# Altium PCB 14MV1.PcbDoc (part 1 of 2)
Units mm, origin at the board's own origin, x right, y up, seen from the top; angles counter-clockwise.
Board outline 48 x 30 mm, 4 copper layers (Top Layer, Layer 1, Layer 2, Bottom Layer), stack 1.743 mm thick; 166 components, 120 nets, 638 pads, 401 vias.
Unrouted connection lines stored in the file: 3.
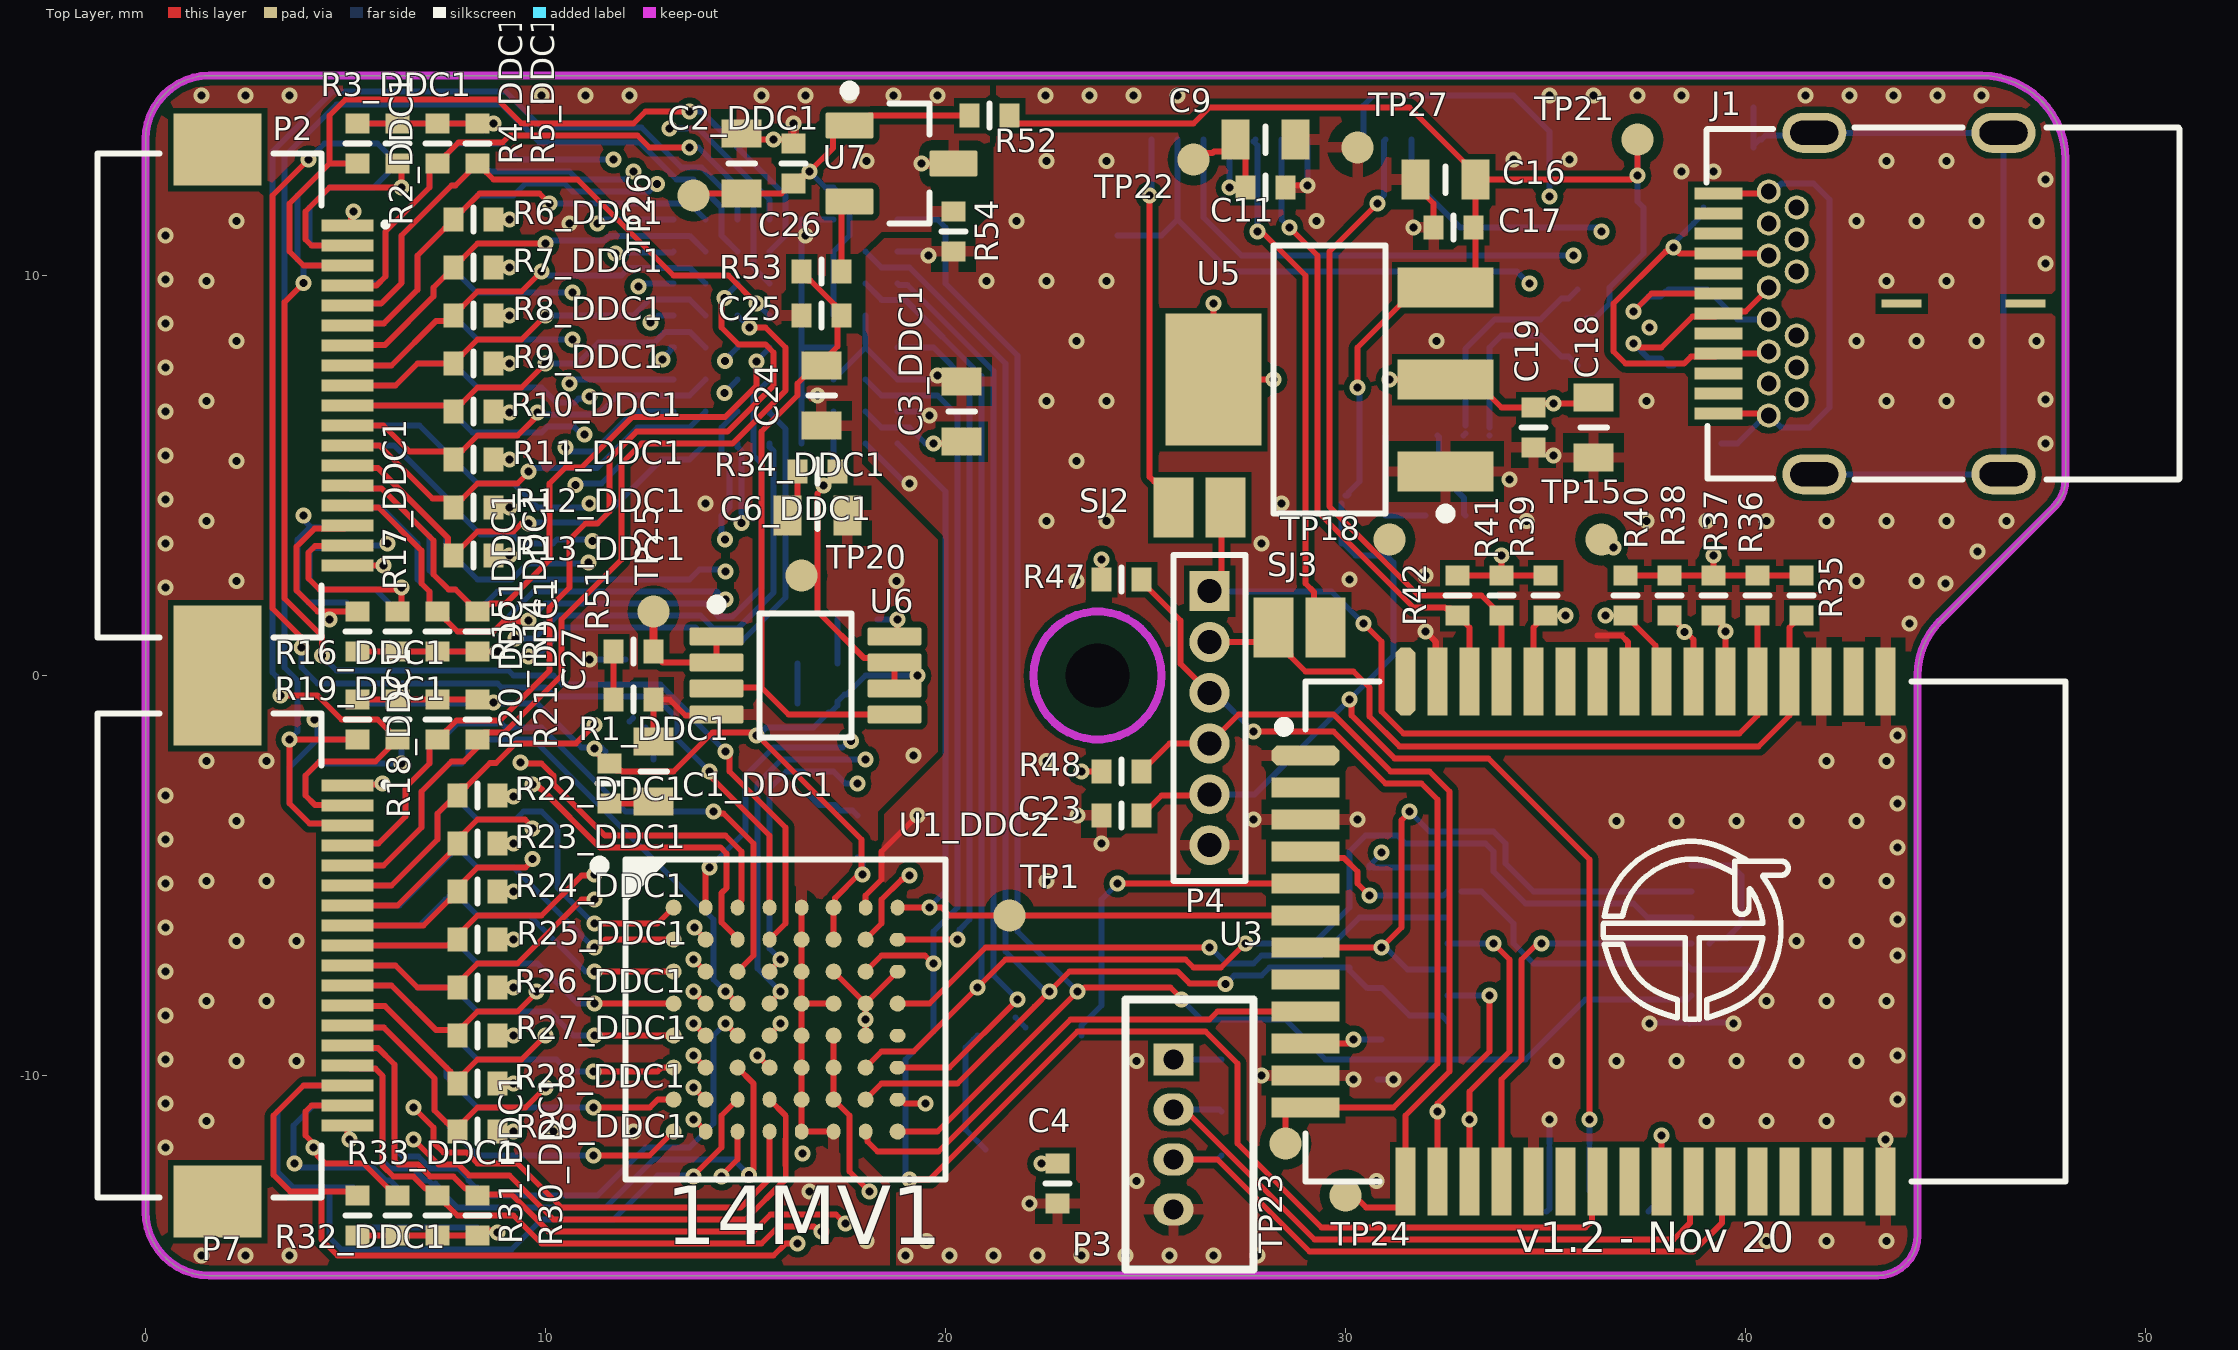
[diagram p0: Top Layer view]
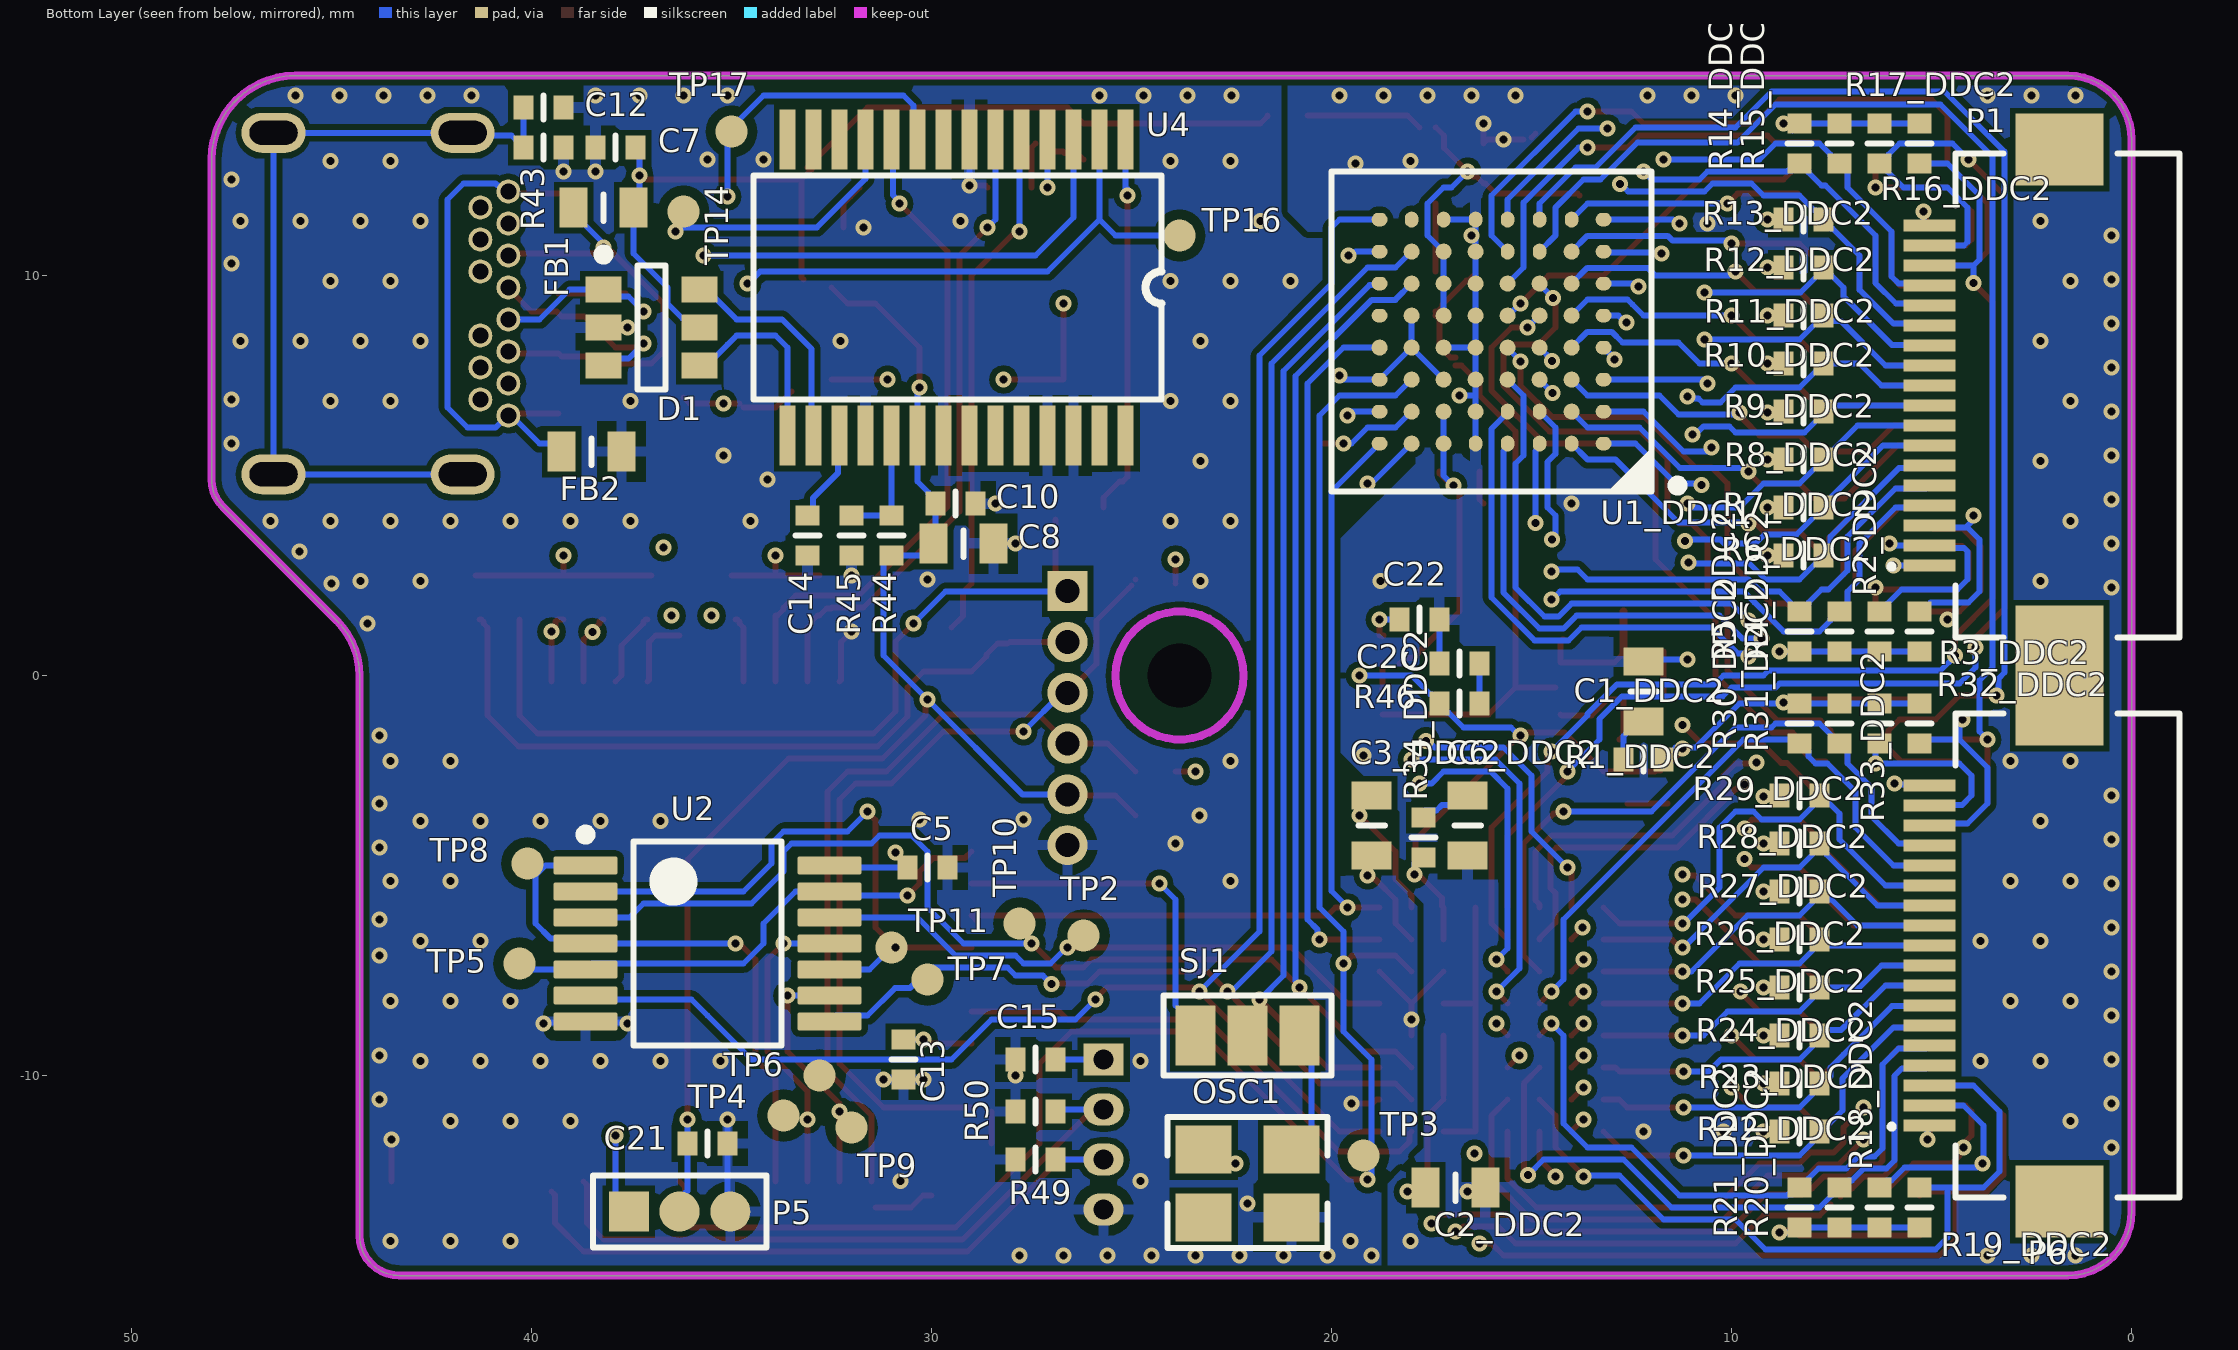
[diagram p1: Bottom Layer view, seen from below]
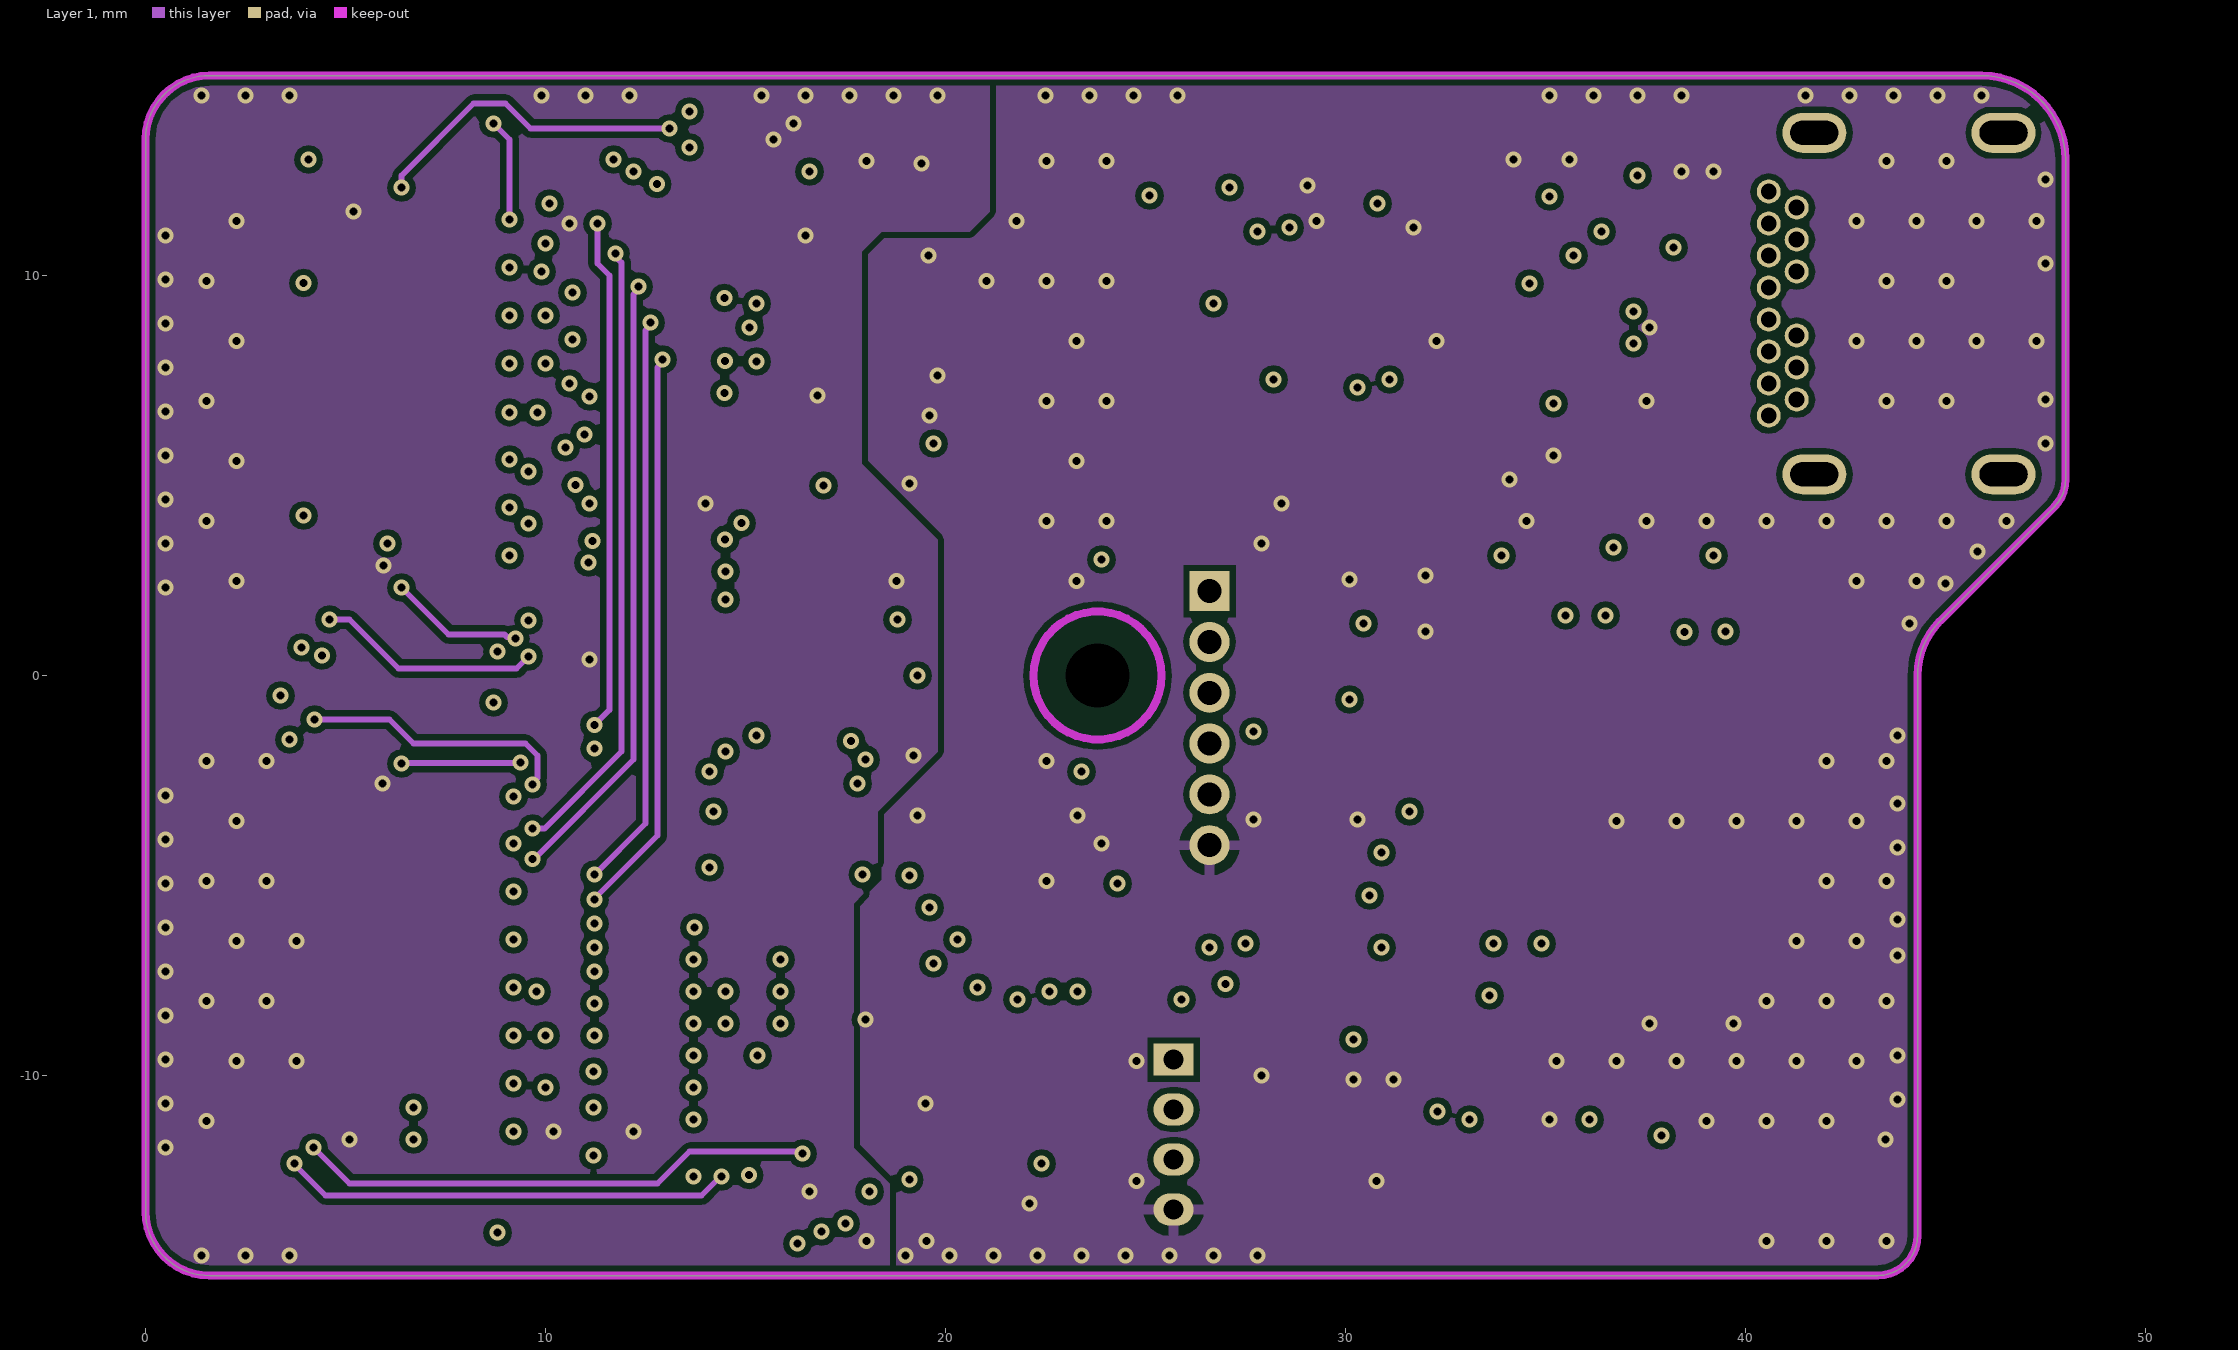
[diagram p2: Layer 1]
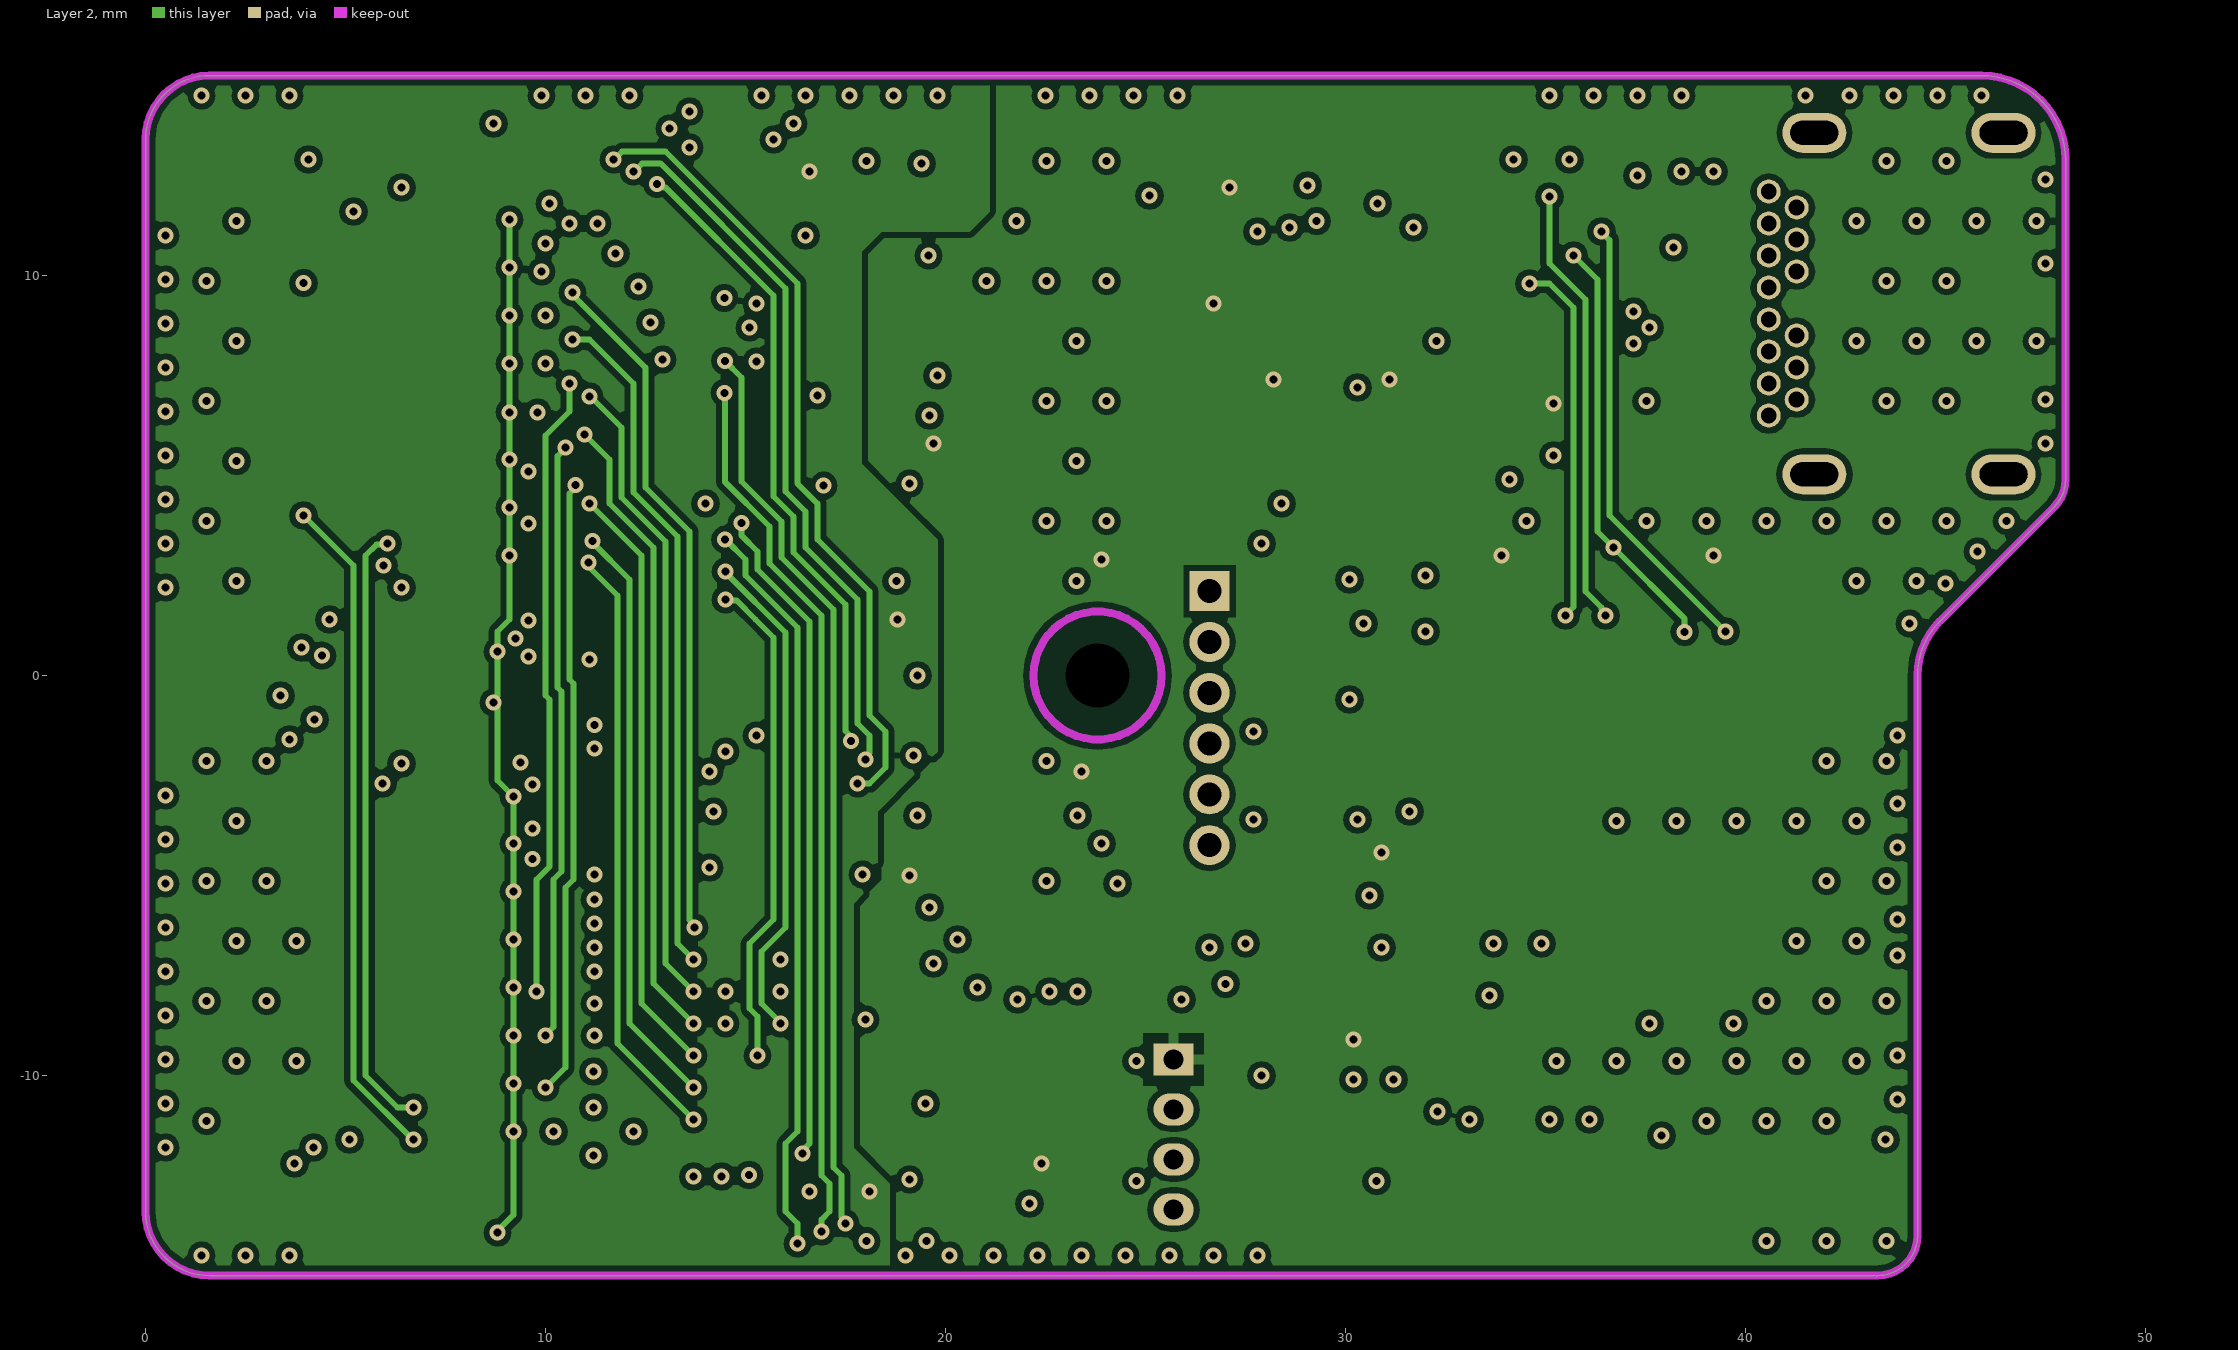
[diagram p3: Layer 2]

## Layer stack, top to bottom
Top Solder: solder mask 0.0102, Solder Resist, Dk 3.5
Top Layer: signal copper 0.0356
Dielectric 1: prepreg 0.0711, PP-006, Dk 4.1
Layer 1: signal copper 0.035
Dielectric1: core 1.46, FR-4, Dk 4.8
Layer 2: signal copper 0.035
Dielectric 2: prepreg 0.0711, PP-006, Dk 4.1
Bottom Layer: signal copper 0.0356
Bottom Solder: solder mask 0.0102, Solder Resist, Dk 3.5

## Board outline
0,-13.4 0,13.4 cw(c1.6,13.4) 1.6,15 45.9,15 cw(c45.9,12.9) 48,12.9 48,4.9 cw(c47.034,4.9) 47.717,4.217 44.866,1.366 ccw(c46.231,0) 44.3,0 44.3,-14 cw(c43.3,-14) 43.3,-15 1.6,-15 cw(c1.6,-13.4)

## Design rules (kind name [scope] priority, off if disabled: settings)
Clearance [All] p1: gap=0.15 ignorepadtopadclearanceinfootprint=FALSE
DiffPairsRouting [All] p1: maxlimit=0.3 minlimit=0.2 mostfreqgap=0.2 toplayer_minwidth=0.2 toplayer_maxwidth=1 toplayer_prefwidth=0.2 midlayer1_minwidth=0.2 midlayer1_maxwidth=1 midlayer1_prefwidth=0.2 midlayer2_minwidth=0.2 midlayer2_maxwidth=1 midlayer2_prefwidth=0.2 bottomlayer_minwidth=0.2 bottomlayer_maxwidth=1 bottomlayer_prefwidth=0.2 maxuncoupledlength=12.7
HoleSize [All] p1: absolutevalues=TRUE maxlimit=10 minlimit=0.025 maxpercent=80.000 minpercent=20.000
MinimumSolderMaskSliver [All] p1: minsoldermaskwidth=0
PolygonConnect PolygonConnect_1 [(InComponentClass('All Components'))] p1: connectstyle=Relief reliefconductorwidth=0.254 reliefentries=4 polygonreliefangle="90 Angle" airgapwidth=0.254
PolygonConnect [All] p2: connectstyle=Direct reliefconductorwidth=0.254 reliefentries=4 polygonreliefangle="90 Angle" airgapwidth=0.254
RoutingVias [All] p1: holewidth=0.3 width=0.6 viastyle="Through Hole" minholewidth=0.2 minwidth=0.4 maxholewidth=1 maxwidth=2
SilkToSilkClearance [All] p1: silktosilkclearance=-10
SilkToSolderMaskClearance SilkscreenOverComponentPads [IsPad] p1: minsilkscreentomaskgap=-10 clearancetoexposedcopper=TRUE
SolderMaskExpansion [All] p1: expansion=0.102 istentingtop=FALSE
Width [All] p1: maxlimit=2 minlimit=0.15 preferedwidth=0.3
25 further rules are at their usual default settings.

## Classes and differential pairs
channel class DDC: DDC1 DDC2
component class DDC1: C1_DDC1 C2_DDC1 C3_DDC1 C6_DDC1 R1_DDC1 R2_DDC1 R3_DDC1 R4_DDC1 R5_DDC1 R6_DDC1 R7_DDC1 R8_DDC1 R9_DDC1 R10_DDC1 R11_DDC1 R12_DDC1 R13_DDC1 R14_DDC1 R15_DDC1 R16_DDC1 R17_DDC1 R18_DDC1 R19_DDC1 R20_DDC1 R21_DDC1 R22_DDC1 R23_DDC1 R24_DDC1 R25_DDC1 R26_DDC1 R27_DDC1 R28_DDC1 R29_DDC1 R30_DDC1 R31_DDC1 R32_DDC1 R33_DDC1 R34_DDC1 U1_DDC1
component class DDC2: C1_DDC2 C2_DDC2 C3_DDC2 C6_DDC2 R1_DDC2 R2_DDC2 R3_DDC2 R4_DDC2 R5_DDC2 R6_DDC2 R7_DDC2 R8_DDC2 R9_DDC2 R10_DDC2 R11_DDC2 R12_DDC2 R13_DDC2 R14_DDC2 R15_DDC2 R16_DDC2 R17_DDC2 R18_DDC2 R19_DDC2 R20_DDC2 R21_DDC2 R22_DDC2 R23_DDC2 R24_DDC2 R25_DDC2 R26_DDC2 R27_DDC2 R28_DDC2 R29_DDC2 R30_DDC2 R31_DDC2 R32_DDC2 R33_DDC2 R34_DDC2 U1_DDC2
component class 14MV1: C4 C5 C7 C8 C9 C10 C11 C12 C13 C14 C15 C16 C17 C18 C19 C20 C21 C22 C23 C24 C25 C26 C27 D1 FB1 FB2 J1 OSC1 P1 P2 P3 P4 P5 P6 P7 R35 R36 R37 R38 R39 R40 R41 R42 R43 R44 R45 R46 R47 R48 R49 R50 R51 R52 R53 R54 SJ1 SJ2 SJ3 TP1 TP2 TP3 TP4 TP5 TP6 TP7 TP8 TP9 TP10 TP11 TP14 TP15 TP16 TP17 TP18 TP20 TP21 TP22 TP23 TP24 TP25 TP26 TP27 U2 U3 U4 U5 U6 U7
differential pair USB: +USB_P -USB_N
differential pair D: +D_P -D_N

## Components (designator, comment, footprint, x,y, rotation, side; value= is the part's Value field where it differs from the comment)
C1_DDC1 "10u" 0603 12.7,-2.4 r90 top (schematic designator C1)
C1_DDC2 "10u" 0603 12.2,-0.4 r90 bottom (schematic designator C1)
C2_DDC1 "10u" 0603 14.9,12.8 r270 top (schematic designator C2)
C2_DDC2 "10u" 0603 16.9,-12.8 r0 bottom (schematic designator C2)
C3_DDC1 "10u" 0603 20.4,6.6 r270 top (schematic designator C3)
C3_DDC2 "10u" 0603 19,-3.75 r270 bottom (schematic designator C3)
C4 "100n" 0402 22.8,-12.7 r270 top
C5 "100n" 0402 30.1,-4.8 r0 bottom
C6_DDC1 "10u" 0603 16.8,4 r0 top (schematic designator C6)
C6_DDC2 "10u" 0603 16.599,-3.75 r270 bottom (schematic designator C6)
C7 "100n" 0402 37.9,13.2 r0 bottom
C8 "10u" 0603 29.2,3.3 r180 bottom
C9 "10u" 0603 28,13.4 r0 top
C10 "100n" 0402 29.4,4.3 r180 bottom
C11 "100n" 0402 28,12.2 r0 top
C12 "100n" 0402 39.7,14.2 r180 bottom
C13 "100n" 0402 30.7,-9.6 r270 bottom
C14 "100n" 0402 33.1,3.5 r90 bottom
C15 "100n" 0402 27.4,-9.6 r0 bottom
C16 "10u" 0603 32.5,12.4 r180 top
C17 "100n" 0402 32.7,11.2 r180 top
C18 "10u" 0603 36.2,6.2 r270 top
C19 "100n" 0402 34.7,6.2 r270 top
C20 "100n" 0402 16.8,0.3 r0 bottom
C21 "100n" 0402 35.6,-11.7 r180 bottom
C22 "100n" 0402 17.8,1.4 r180 bottom
C23 "100n" 0402 24.4,-3.5 r180 top
C24 "10u" 0603 16.9,7 r270 top
C25 "100n" 0402 16.9,9 r180 top
C26 "100n" 0402 16.2,12.8 r90 top
C27 "100n" 0402 12.2,-0.6 r0 top
D1 "USBLC6-2SC6" SOT23-6 37,8.7 r180 bottom
FB1 "7427922808" 0603 38.2,11.7 r0 bottom
FB2 "7427922808" 0603 38.5,5.6 r180 bottom
J1 "632723100011" 632723100011 47.8,9.3 r90 top
OSC1 "ASE-10.000MHZ-LC-T" XTAL_SMD3225 22.1,-12.7 r90 bottom
P1 "FH12-18S-0.5SH(55)" FH12-18S-0.5SH(55) 4.4,7 r90 bottom locked
P2 "FH12-18S-0.5SH(55)" FH12-18S-0.5SH(55) 4.4,7 r270 top locked
P3 "530470410" MOLEX_4_V 25.7,-9.6 r270 top
P4 "MHDR1X6" MHDR1X6 26.6,2.11 r270 top
P5 "MHDR1X3" MHDR1X3 37.57,-13.4 r180 bottom
P6 "FH12-18S-0.5SH(55)" FH12-18S-0.5SH(55) 4.4,-7 r90 bottom locked
P7 "FH12-18S-0.5SH(55)" FH12-18S-0.5SH(55) 4.4,-7 r270 top locked
R1_DDC1 "0R68" 0402 11.6,-2.7 r90 top (schematic designator R1)
R1_DDC2 "0R68" 0402 12.2,-2.1 r180 bottom (schematic designator R1)
R2_DDC1 "13M" 0402 6.3,13.3 r90 top (schematic designator R2)
R2_DDC2 "13M" 0402 6.3,1.1 r270 bottom (schematic designator R2)
R3_DDC1 "13M" 0402 5.3,13.3 r90 top (schematic designator R3)
R3_DDC2 "13M" 0402 5.3,1.1 r270 bottom (schematic designator R3)
R4_DDC1 "13M" 0402 7.3,13.3 r90 top (schematic designator R4)
R4_DDC2 "13M" 0402 7.3,1.1 r270 bottom (schematic designator R4)
R5_DDC1 "13M" 0402 8.3,13.3 r90 top (schematic designator R5)
R5_DDC2 "13M" 0402 8.3,1.1 r270 bottom (schematic designator R5)
R6_DDC1 "13M" 0402 8.2,11.4 r0 top (schematic designator R6)
R6_DDC2 "13M" 0402 8.2,3 r0 bottom (schematic designator R6)
R7_DDC1 "13M" 0402 8.2,10.2 r0 top (schematic designator R7)
R7_DDC2 "13M" 0402 8.2,4.2 r0 bottom (schematic designator R7)
R8_DDC1 "13M" 0402 8.2,9 r0 top (schematic designator R8)
R8_DDC2 "13M" 0402 8.2,5.4 r0 bottom (schematic designator R8)
R9_DDC1 "13M" 0402 8.2,7.8 r0 top (schematic designator R9)
R9_DDC2 "13M" 0402 8.2,6.6 r0 bottom (schematic designator R9)
R10_DDC1 "13M" 0402 8.2,6.6 r0 top (schematic designator R10)
R10_DDC2 "13M" 0402 8.2,7.8 r0 bottom (schematic designator R10)
R11_DDC1 "13M" 0402 8.2,5.4 r0 top (schematic designator R11)
R11_DDC2 "13M" 0402 8.2,9 r0 bottom (schematic designator R11)
R12_DDC1 "13M" 0402 8.2,4.2 r0 top (schematic designator R12)
R12_DDC2 "13M" 0402 8.2,10.2 r0 bottom (schematic designator R12)
R13_DDC1 "13M" 0402 8.2,3 r0 top (schematic designator R13)
R13_DDC2 "13M" 0402 8.2,11.4 r0 bottom (schematic designator R13)
R14_DDC1 "13M" 0402 8.3,1.1 r270 top (schematic designator R14)
R14_DDC2 "13M" 0402 8.3,13.3 r90 bottom (schematic designator R14)
R15_DDC1 "13M" 0402 7.3,1.1 r270 top (schematic designator R15)
R15_DDC2 "13M" 0402 7.3,13.3 r90 bottom (schematic designator R15)
R16_DDC1 "13M" 0402 5.3,1.1 r270 top (schematic designator R16)
R16_DDC2 "13M" 0402 5.3,13.3 r90 bottom (schematic designator R16)
R17_DDC1 "13M" 0402 6.3,1.1 r270 top (schematic designator R17)
R17_DDC2 "13M" 0402 6.3,13.3 r90 bottom (schematic designator R17)
R18_DDC1 "13M" 0402 6.3,-1.1 r90 top (schematic designator R18)
R18_DDC2 "13M" 0402 6.3,-13.3 r270 bottom (schematic designator R18)
R19_DDC1 "13M" 0402 5.3,-1.1 r90 top (schematic designator R19)
R19_DDC2 "13M" 0402 5.3,-13.3 r270 bottom (schematic designator R19)
R20_DDC1 "13M" 0402 7.3,-1.1 r90 top (schematic designator R20)
R20_DDC2 "13M" 0402 7.3,-13.3 r270 bottom (schematic designator R20)
R21_DDC1 "13M" 0402 8.3,-1.1 r90 top (schematic designator R21)
R21_DDC2 "13M" 0402 8.3,-13.3 r270 bottom (schematic designator R21)
R22_DDC1 "13M" 0402 8.3,-3 r0 top (schematic designator R22)
R22_DDC2 "13M" 0402 8.3,-11.4 r0 bottom (schematic designator R22)
R23_DDC1 "13M" 0402 8.3,-4.2 r0 top (schematic designator R23)
R23_DDC2 "13M" 0402 8.3,-10.2 r0 bottom (schematic designator R23)
R24_DDC1 "13M" 0402 8.3,-5.4 r0 top (schematic designator R24)
R24_DDC2 "13M" 0402 8.3,-9 r0 bottom (schematic designator R24)
R25_DDC1 "13M" 0402 8.3,-6.6 r0 top (schematic designator R25)
R25_DDC2 "13M" 0402 8.3,-7.8 r0 bottom (schematic designator R25)
R26_DDC1 "13M" 0402 8.3,-7.8 r0 top (schematic designator R26)
R26_DDC2 "13M" 0402 8.3,-6.6 r0 bottom (schematic designator R26)
R27_DDC1 "13M" 0402 8.3,-9 r0 top (schematic designator R27)
R27_DDC2 "13M" 0402 8.3,-5.4 r0 bottom (schematic designator R27)
R28_DDC1 "13M" 0402 8.3,-10.2 r0 top (schematic designator R28)
R28_DDC2 "13M" 0402 8.3,-4.2 r0 bottom (schematic designator R28)
R29_DDC1 "13M" 0402 8.3,-11.4 r0 top (schematic designator R29)
R29_DDC2 "13M" 0402 8.3,-3 r0 bottom (schematic designator R29)
R30_DDC1 "13M" 0402 8.3,-13.5 r270 top (schematic designator R30)
R30_DDC2 "13M" 0402 8.3,-1.2 r90 bottom (schematic designator R30)
R31_DDC1 "13M" 0402 7.3,-13.5 r270 top (schematic designator R31)
R31_DDC2 "13M" 0402 7.3,-1.2 r90 bottom (schematic designator R31)
R32_DDC1 "13M" 0402 5.3,-13.5 r270 top (schematic designator R32)
R32_DDC2 "13M" 0402 5.3,-1.2 r90 bottom (schematic designator R32)
R33_DDC1 "13M" 0402 6.3,-13.5 r270 top (schematic designator R33)
R33_DDC2 "13M" 0402 6.3,-1.2 r90 bottom (schematic designator R33)
R34_DDC1 "0R68" 0402 16.8,5.1 r0 top (schematic designator R34)
R34_DDC2 "0R68" 0402 17.7,-4.05 r270 bottom (schematic designator R34)
R35 "10k" 0402 41.4,2 r90 top
R36 "10k" 0402 40.3,2 r90 top
R37 "10k" 0402 39.2,2 r90 top
R38 "10k" 0402 38.1,2 r90 top
R39 "10k" 0402 35,2 r90 top
R40 "10k" 0402 37,2 r90 top
R41 "10k" 0402 33.9,2 r90 top
R42 "10k" 0402 32.8,2 r90 top
R43 "10k" 0402 39.7,13.2 r0 bottom
R44 "4k7" 0402 31,3.5 r270 bottom
R45 "10k" 0402 32,3.5 r270 bottom
R46 "0R68" 0402 16.8,-0.7 r0 bottom
R47 "10k" 0402 24.4,2.4 r180 top
R48 "10k" 0402 24.4,-2.4 r180 top
R49 "10k" 0402 27.4,-12.1 r0 bottom
R50 "NM" 0402 27.4,-10.9 r0 bottom
R51 "0R68" 0402 12.2,0.6 r0 top
R52 "0R" 0402 21.1,14 r0 top
R53 "1k" 0402 16.9,10.1 r0 top
R54 "0R" 0402 20.2,11.1 r270 top
SJ1 "Sold Jum" Solder_j2 23.4,-9 r180 bottom
SJ2 "Sold Jum" Solder_j 25.7,4.2 r180 top
SJ3 "Sold Jum" Solder_j 29.5,1.2 r0 top
TP1 "TestPoint" PIAZZOLA 21.6,-6 r90 top
TP2 "TestPoint" PIAZZOLA 26.2,-6.5 r90 bottom
TP3 "TestPoint" PIAZZOLA 19.2,-12 r90 bottom
TP4 "TestPoint" PIAZZOLA 33.7,-11 r90 bottom
TP5 "TestPoint" PIAZZOLA 40.3,-7.2 r90 bottom
TP6 "TestPoint" PIAZZOLA 32.8,-10 r90 bottom
TP7 "TestPoint" PIAZZOLA 30.1,-7.6 r90 bottom
TP8 "TestPoint" PIAZZOLA 40.1,-4.7 r90 bottom
TP9 "TestPoint" PIAZZOLA 32,-11.3 r90 bottom
TP10 "TestPoint" PIAZZOLA 27.8,-6.2 r90 bottom
TP11 "TestPoint" PIAZZOLA 31,-6.8 r90 bottom
TP14 "TestPoint" PIAZZOLA 36.2,11.6 r90 bottom
TP15 "TestPoint" PIAZZOLA 36.4,3.4 r90 top
TP16 "TestPoint" PIAZZOLA 23.8,11 r90 bottom
TP17 "TestPoint" PIAZZOLA 35,13.6 r90 bottom
TP18 "TestPoint" PIAZZOLA 31.1,3.4 r90 top
TP20 "TestPoint" PIAZZOLA 16.4,2.5 r90 top
TP21 "TestPoint" PIAZZOLA 37.3,13.4 r90 top
TP22 "TestPoint" PIAZZOLA 26.2,12.9 r90 top
TP23 "TestPoint" PIAZZOLA 28.5,-11.7 r90 top
TP24 "TestPoint" PIAZZOLA 30,-13 r90 top
TP25 "TestPoint" PIAZZOLA 12.7,1.6 r90 top
TP26 "TestPoint" PIAZZOLA 13.7,12 r90 top
TP27 "TestPoint" PIAZZOLA 30.3,13.2 r90 top
U1_DDC1 "DDC232CZXGR" TI-ZXG64#1 16,8.6 r0 bottom (schematic designator U1)
U1_DDC2 "DDC232CZXGR" TI-ZXG64#2 16,-8.6 r0 top (schematic designator U1)
U2 "SN74HC08PWR" PW0014A_M 35.6,-6.7 r180 bottom
U3 "BL600-SA" LIRD-BL600-SA_V 38.5,-6.4 r270 top
U4 "FT232RL" TSSOP28-W 25.15,13.4 r270 bottom
U5 "LD1117S33CTR" SOT-223_N 29.6,7.4 r180 top
U6 "OPA2350EA/250" DGK0008A_N 16.5,0 r0 top
U7 "REF3040AIDBZT" DBZ0003A_M 18.9,12.8 r0 top

## Footprints (in the part's own frame and the unit in brackets; to place one, negate y for a bottom-side part, rotate by r counter-clockwise, add the part's x,y. Pads: shape width x height; smd on the part's side, far side on the other; paste and mask are expansions set on the pad)
0402 [mm]
  rect 0.5x0.6 smd: 1(-0.5,0) 2(0.5,0)
  silkscreen extent 0,-0.3 0,0.3, body extent -0.5,-0.25 0.5,0.25, height 0.35
0603 [mm]
  rect 0.7x1 smd: 1(-0.75,0) 2(0.75,0)
  silkscreen extent 0,-0.33 0,0.33, body extent -0.85,-0.47 0.85,0.48, height 0.6
632723100011 [mm]
  rect 0.3x1.2 smd: A1(-2.75,8.48) A2(-2.25,8.48) A3(-1.75,8.48) A4(-1.25,8.48) A5(-0.75,8.48) A6(-0.25,8.48) A7(0.25,8.48) A8(0.75,8.48) A9(1.25,8.48) A10(1.75,8.48) A11(2.25,8.48) A12(2.75,8.48)
  round 0.6 hole 0.4: B1(2.8,7.22) B2(2.4,6.52) B3(1.6,6.52) B4(1.2,7.22) B5(0.8,6.52) B6(0.4,7.22) B7(-0.4,7.22) B8(-0.8,6.52) B9(-1.2,7.22) B10(-1.6,6.52) B11(-2.4,6.52) B12(-2.8,7.22) GND(-2,7.22) GND(2,7.22)
  oval 1x1.6 hole 0.6 slot 1.2 at 90 deg: Shell(-4.27,6.08) Shell(-4.27,1.35) Shell(4.27,6.08) Shell(4.27,1.35)
  rect 0.2x1 smd: ""(0,3.9) ""(0,0.8)
  silkscreen extent -4.4,-3.05 4.4,8.77, body extent -4.4,-3.02 4.34,8.77, height 3.08
DBZ0003A_M [mm] "SOT23, 3-Leads, Body 3.04x1.4mm, Pitch 0.95mm, IPC Low Density"
  rrect15% 1.2x0.65 smd: 1(-1.3,0.95) 2(-1.3,-0.95) 3(1.3,0)
  silkscreen extent -1.42,-1.5 0.7,1.95, body extent -1.26,-1.46 1.26,1.46, height 0.96
DGK0008A_N [mm] "TSOP, 8-Leads, Body 3.1x3.1mm, Pitch 0.65mm, IPC Medium Density"
  rrect22% 1.35x0.45 smd: 1(-2.225,0.975) 2(-2.225,0.325) 3(-2.225,-0.325) 4(-2.225,-0.975) 5(2.225,-0.975) 6(2.225,-0.325) 7(2.225,0.325) 8(2.225,0.975)
  silkscreen extent -2.35,-1.55 1.15,1.9, body extent -2.45,-1.5 2.45,1.5, height 0.94
FH12-18S-0.5SH(55) [mm]
  rect 0.3x1.3 smd: 1(-4.25,0.65) 2(-3.75,0.65) 3(-3.25,0.65) 4(-2.75,0.65) 5(-2.25,0.65) 6(-1.75,0.65) 7(-1.25,0.65) 8(-0.75,0.65) 9(-0.25,0.65) 10(0.25,0.65) 11(0.75,0.65) 12(1.25,0.65) 13(1.75,0.65) 14(2.25,0.65) 15(2.75,0.65) 16(3.25,0.65) 17(3.75,0.65) 18(4.25,0.65)
  rect 1.8x2.2 smd: 19(-6.15,-2.6) 20(6.15,-2.6)
  silkscreen extent -6.05,-5.6 6.05,1.62, body extent -6.54,-5.65 6.56,0.75, height 2.1
LIRD-BL600-SA_V [mm] "SMD, 44-Leads, Body 19x12.5mm, Pitch 0.8mm"
  oct 0.5x1.7 smd: 1(-4.4,-9.5)
  rect 0.5x1.7 smd: 2(-3.6,-9.5) 3(-2.8,-9.5) 4(-2,-9.5) 5(-1.2,-9.5) 6(-0.4,-9.5) 7(0.4,-9.5) 8(1.2,-9.5) 9(2,-9.5) 10(2.8,-9.5) 11(3.6,-9.5) 12(4.4,-9.5)
  rect 1.7x0.5 smd: 13(6.25,-7) 14(6.25,-6.2) 15(6.25,-5.4) 16(6.25,-4.6) 17(6.25,-3.8) 18(6.25,-3) 19(6.25,-2.2) 20(6.25,-1.4) 21(6.25,-0.6) 22(6.25,0.2) 23(6.25,1) 24(6.25,1.8) 25(6.25,2.6) 26(6.25,3.4) 27(6.25,4.2) 28(6.25,5) 29(-6.25,5) 30(-6.25,4.2) 31(-6.25,3.4) 32(-6.25,2.6) 33(-6.25,1.8) 34(-6.25,1) 35(-6.25,0.2) 36(-6.25,-0.6) 37(-6.25,-1.4) 38(-6.25,-2.2) 39(-6.25,-3) 40(-6.25,-3.8) 41(-6.25,-4.6) 42(-6.25,-5.4) 43(-6.25,-6.2)
  oct 1.7x0.5 smd: 44(-6.25,-7)
  silkscreen extent -6.25,-10.16 6.25,9.5, body extent -6.25,-9.5 6.25,9.5, height 3.27
MHDR1X3 [mm] "Connector; Header; 3 Position"
  rect 1x1 smd: 1(0,0)
  round 1 smd: 2(1.27,0) 3(2.54,0)
  silkscreen extent -0.9,-0.9 3.44,0.9
MHDR1X6 [mm] "Connector; Header; 6 Position"
  rect 1x1 hole 0.6: 1(0,0)
  round 1 hole 0.6: 2(1.27,0) 3(2.54,0) 4(3.81,0) 5(5.08,0) 6(6.35,0)
  silkscreen extent -0.9,-0.9 7.25,0.9
MOLEX_4_V [mm]
  rect 0.8x1 hole 0.5: 1(0,0)
  oval 0.8x1 hole 0.5: 2(1.25,0) 3(2.5,0) 4(3.75,0)
  silkscreen extent -1.5,-1.2 5.25,2, body extent -1.5,-1.15 5.25,2.05, height 4.2
PIAZZOLA [mm]
  round 0.8 smd: 1(0,0)
PW0014A_M [mm] "SOP, 14-Leads, Body 5.1x4.5mm, Pitch 0.65mm, IPC Low Density"
  rrect22% 1.6x0.45 smd: 1(-3.05,1.95) 2(-3.05,1.3) 3(-3.05,0.65) 4(-3.05,0) 5(-3.05,-0.65) 6(-3.05,-1.3) 7(-3.05,-1.95) 8(3.05,-1.95) 9(3.05,-1.3) 10(3.05,-0.65) 11(3.05,0) 12(3.05,0.65) 13(3.05,1.3) 14(3.05,1.95)
  silkscreen extent -3.17,-2.55 1.85,2.85, body extent -3.21,-2.5 3.21,2.5, height 1
Solder_j [mm]
  rect 1x1.5 smd: 1(-1.3,0) 2(0,0)
Solder_j2 [mm]
  rect 1x1.5 smd: 1(0,0) 2(1.3,0) 3(2.6,0)
  silkscreen extent -0.8,-1 3.4,1
SOT23-6 [mm]
  rect 0.9x0.65 smd: 1(-1.2,0.95) 2(-1.2,0) 3(-1.2,-0.95) 4(1.2,-0.95) 5(1.2,0) 6(1.2,0.95)
  silkscreen extent -1.33,-1.55 0.35,1.95, body extent -0.9,-1.55 0.9,1.55, height 1.45
SOT-223_N [mm] "SOT223, 4-Leads, Body 6.5x3.5mm, Pitch 2.3mm, Lead Span 7mm, IPC Medium Density"
  rect 2.4x1 smd: 1(-2.9,2.3) 2(-2.9,0) 3(-2.9,-2.3)
  rect 2.4x3.3 smd: 4(2.9,0)
  silkscreen extent -3.03,-3.35 1.4,3.47, body extent -1.85,-3.35 1.85,3.35, height 1.8
TI-ZXG64#1 [mm] "BGA, 64-Balls, Body 8x8mm, Pitch 0.8mm"
  oval 0.4x0.34 smd: A1(-2.8,2.8) A8(2.8,2.8) B1(-2.8,2) B8(2.8,2) C1(-2.8,1.2) C8(2.8,1.2) D1(-2.8,0.4) E1(-2.8,-0.4) E8(2.8,-0.4) F1(-2.8,-1.2) F8(2.8,-1.2) G1(-2.8,-2) G8(2.8,-2) H1(-2.8,-2.8) H8(2.8,-2.8)
  oval 0.34x0.4 smd: A2(-2,2.8) A3(-1.2,2.8) A4(-0.4,2.8) A5(0.4,2.8) B3(-1.2,2) B4(-0.4,2) G3(-1.2,-2) G4(-0.4,-2) H2(-2,-2.8) H3(-1.2,-2.8) H4(-0.4,-2.8) H5(0.4,-2.8) H6(1.2,-2.8) H7(2,-2.8)
  round 0.4 smd: A6(1.2,2.8) A7(2,2.8) B2(-2,2) B5(0.4,2) B6(1.2,2) B7(2,2) C2(-2,1.2) C3(-1.2,1.2) C4(-0.4,1.2) C5(0.4,1.2) C6(1.2,1.2) C7(2,1.2) D2(-2,0.4) D3(-1.2,0.4) D4(-0.4,0.4) D5(0.4,0.4) D6(1.2,0.4) D7(2,0.4) D8(2.8,0.4) E2(-2,-0.4) E3(-1.2,-0.4) E4(-0.4,-0.4) E5(0.4,-0.4) E6(1.2,-0.4) E7(2,-0.4) F2(-2,-1.2) F3(-1.2,-1.2) F4(-0.4,-1.2) F5(0.4,-1.2) F6(1.2,-1.2) F7(2,-1.2) G2(-2,-2) G5(0.4,-2) G6(1.2,-2) G7(2,-2)
  silkscreen extent -4.77,-4 4,4, body extent -4,-4 4,4, height 1.45
TI-ZXG64#2 [mm] "BGA, 64-Balls, Body 8x8mm, Pitch 0.8mm"
  round 0.4 smd: A1(-2.8,2.8) A6(1.2,2.8) B1(-2.8,2) B2(-2,2) B5(0.4,2) B6(1.2,2) B7(2,2) C1(-2.8,1.2) C2(-2,1.2) C3(-1.2,1.2) C4(-0.4,1.2) C5(0.4,1.2) C6(1.2,1.2) C7(2,1.2) D1(-2.8,0.4) D2(-2,0.4) D3(-1.2,0.4) D4(-0.4,0.4) D5(0.4,0.4) D6(1.2,0.4) D7(2,0.4) D8(2.8,0.4) E1(-2.8,-0.4) E2(-2,-0.4) E3(-1.2,-0.4) E4(-0.4,-0.4) E5(0.4,-0.4) E6(1.2,-0.4) E7(2,-0.4) F1(-2.8,-1.2) F2(-2,-1.2) F3(-1.2,-1.2) F4(-0.4,-1.2) F5(0.4,-1.2) F6(1.2,-1.2) F7(2,-1.2) G1(-2.8,-2) G2(-2,-2) G5(0.4,-2) G6(1.2,-2) G7(2,-2) H1(-2.8,-2.8) H8(2.8,-2.8)
  oval 0.34x0.4 smd: A2(-2,2.8) A3(-1.2,2.8) A4(-0.4,2.8) A5(0.4,2.8) A7(2,2.8) A8(2.8,2.8) B3(-1.2,2) B4(-0.4,2) G3(-1.2,-2) G4(-0.4,-2) H2(-2,-2.8) H3(-1.2,-2.8) H4(-0.4,-2.8) H5(0.4,-2.8) H6(1.2,-2.8) H7(2,-2.8)
  oval 0.4x0.34 smd: B8(2.8,2) C8(2.8,1.2) E8(2.8,-0.4) F8(2.8,-1.2) G8(2.8,-2)
  silkscreen extent -4.77,-4 4,4, body extent -4,-4 4,4, height 1.45
TSSOP28-W [mm]
  rect 1.5x0.4 smd: 1(0,0) 2(0,-0.65) 3(0,-1.3) 4(0,-1.95) 5(0,-2.6) 6(0,-3.25) 7(0,-3.9) 8(0,-4.55) 9(0,-5.2) 10(0,-5.85) 11(0,-6.5) 12(0,-7.15) 13(0,-7.8) 14(0,-8.45) 15(7.4,-8.45) 16(7.4,-7.8) 17(7.4,-7.15) 18(7.4,-6.5) 19(7.4,-5.85) 20(7.4,-5.2) 21(7.4,-4.55) 22(7.4,-3.9) 23(7.4,-3.25) 24(7.4,-2.6) 25(7.4,-1.95) 26(7.4,-1.3) 27(7.4,-0.65) 28(7.4,0)
  silkscreen extent 0.9,-9.3 6.5,0.9, body extent 0.9,-9.3 6.5,0.9, height 1.75
XTAL_SMD3225 [mm]
  rect 1.2x1.4 smd: 1(-0.85,1.1) 2(-0.85,-1.1) 3(0.85,-1.1) 4(0.85,1.1)
  silkscreen extent -1.61,-2 1.66,2, body extent -1.25,-1.6 1.25,1.6, height 0.61

## Part data
C1_DDC1 C1_DDC2 C2_DDC1 C2_DDC2 C3_DDC1 C3_DDC2 C6_DDC1 C6_DDC2 C8 C9 C16 C18 C24: library part "Cap 10uF", "Capacitor MLCC 25V 10%", LatestRevisionDate=17-Jul-2002, LatestRevisionNote="Re-released for DXP Platform.", Published=8-Jun-2000, Publisher="Altium Limited"
C4 C5 C7 C10 C11 C12 C13 C14 C15 C17 C19 C20 C21 C22 C23 C25 C26 C27: library part "Cap 100nF", "Capacitor X7R 50V 10%", LatestRevisionDate=17-Jul-2002, LatestRevisionNote="Re-released for DXP Platform.", Published=8-Jun-2000, Publisher="Altium Limited"
D1: library part USBUF02W6, "EMI filter and line termination for USB upstream ports", Supplier Part Number 1=497-5235-1-ND, Supplier 1=Digi-Key, Supplier 2=Farnell, Supplier Part Number 2=1269406
FB1 FB2: "Ferrite bead", Supplier Part Number 1=732-6114-1-ND, Supplier 1=Digi-Key, Supplier 2=Farnell, Supplier Part Number 2=2467183
J1: "USB 3.1 Type C Receptacle Horizontal THR WR-COM", Supplier Part Number 1=732-9617-1-ND, ComponentLink1Description=Manufacturer, ComponentLink1URL=http://www.we-online.de, ComponentLink2Description=Datasheet, ComponentLink2URL=http://katalog.we-online.de/em/datasheet/632723x00011.pdf, Construction=THR, Gender=Receptacle, Interface Type="Type C", Part Number=632723100011, Published Date="April 2017", Publisher="Wurth Elektronik", Sub-Family="USB 3.1", Supplier 1=Digi-Key, Supplier 2=Farnell, Supplier Part Number 2=2984360, Type=Horizontal
OSC1: "Oscillator 10 MHz", Supplier Part Number 1=535-9559-1-ND, Supplier 1=Digi-Key, Supplier 2=Mouser, Supplier Part Number 2=815-ASE10.000MHZLCT
P1 P2 P6 P7: "Header, 18-Pin", Supplier Part Number 1=HFJ118CT-ND, LatestRevisionDate=17-Jul-2002, LatestRevisionNote="Re-released for DXP Platform.", Publisher="Altium Limited", Supplier 1=Digi-Key, Supplier 2=RSComponents, Supplier Part Number 2=7388824
P3: "Header, 4-Pin", Supplier Part Number 1=WM1733-ND, LatestRevisionDate=17-Jul-2002, LatestRevisionNote="Re-released for DXP Platform.", Publisher="Altium Limited", Supplier 1=Digi-Key, Supplier 2=Farnell, Supplier Part Number 2=9733060
P4: "Header, 6-Pin", LatestRevisionDate=17-Jul-2002, LatestRevisionNote="Re-released for DXP Platform.", Publisher="Altium Limited"
P5: "Header, 3-Pin", LatestRevisionDate=17-Jul-2002, LatestRevisionNote="Re-released for DXP Platform.", Publisher="Altium Limited"
R1_DDC1 R1_DDC2 R34_DDC1 R34_DDC2 R46 R51: library part "Res 0R68", "Resistor 0.1W 1%", LatestRevisionDate=17-Jul-2002, LatestRevisionNote="Re-released for DXP Platform.", PackageDescription="Axial Device, Thru-Hole; 2 Leads; 0.3 in Pin Spacing", PackageReference=AXIAL-0.3, Published=8-Jun-2000, Publisher="Altium Limited"
R2_DDC1 R2_DDC2 R3_DDC1 R3_DDC2 R4_DDC1 R4_DDC2 R5_DDC1 R5_DDC2 R6_DDC1 R6_DDC2 R7_DDC1 R7_DDC2 R8_DDC1 R8_DDC2 R9_DDC1 R9_DDC2 R10_DDC1 R10_DDC2 R11_DDC1 R11_DDC2 R12_DDC1 R12_DDC2 R13_DDC1 R13_DDC2 R14_DDC1 R14_DDC2 R15_DDC1 R15_DDC2 R16_DDC1 R16_DDC2 R17_DDC1 R17_DDC2 R18_DDC1 R18_DDC2 R19_DDC1 R19_DDC2 R20_DDC1 R20_DDC2 R21_DDC1 R21_DDC2 R22_DDC1 R22_DDC2 R23_DDC1 R23_DDC2 R24_DDC1 R24_DDC2 R25_DDC1 R25_DDC2 R26_DDC1 R26_DDC2 R27_DDC1 R27_DDC2 R28_DDC1 R28_DDC2 R29_DDC1 R29_DDC2 R30_DDC1 R30_DDC2 R31_DDC1 R31_DDC2 R32_DDC1 R32_DDC2 R33_DDC1 R33_DDC2: library part "Res 13M", "Resistor 0.1W 1%", LatestRevisionDate=17-Jul-2002, LatestRevisionNote="Re-released for DXP Platform.", PackageDescription="Axial Device, Thru-Hole; 2 Leads; 0.3 in Pin Spacing", PackageReference=AXIAL-0.3, Published=8-Jun-2000, Publisher="Altium Limited"
R35 R36 R37 R38 R39 R40 R41 R42 R43 R45 R47 R48 R49: library part "Res 10k", "Resistor 0.1W 1%", LatestRevisionDate=17-Jul-2002, LatestRevisionNote="Re-released for DXP Platform.", PackageDescription="Axial Device, Thru-Hole; 2 Leads; 0.3 in Pin Spacing", PackageReference=AXIAL-0.3, Published=8-Jun-2000, Publisher="Altium Limited"
R44: library part "Res 4k7", "Resistor 0.1W 1%", LatestRevisionDate=17-Jul-2002, LatestRevisionNote="Re-released for DXP Platform.", PackageDescription="Axial Device, Thru-Hole; 2 Leads; 0.3 in Pin Spacing", PackageReference=AXIAL-0.3, Published=8-Jun-2000, Publisher="Altium Limited"
R50: library part "Res NM", "Resistor 0.1W 1%", Fitted=NO, Published=8-Jun-2000, Publisher="Altium Limited", Revision="July-2002: Re-released for DXP Platform."
R52 R54: library part "Res 0R", "Resistor 0.1W 1%", LatestRevisionDate=17-Jul-2002, LatestRevisionNote="Re-released for DXP Platform.", PackageDescription="Axial Device, Thru-Hole; 2 Leads; 0.3 in Pin Spacing", PackageReference=AXIAL-0.3, Published=8-Jun-2000, Publisher="Altium Limited"
R53: library part "Res 1k", "Resistor 0.1W 1%", LatestRevisionDate=17-Jul-2002, LatestRevisionNote="Re-released for DXP Platform.", PackageDescription="Axial Device, Thru-Hole; 2 Leads; 0.3 in Pin Spacing", PackageReference=AXIAL-0.3, Published=8-Jun-2000, Publisher="Altium Limited"
SJ1: library part SJ2, "Double solder jumper"
SJ2 SJ3: library part SJ, "Solder Jumper"
U1_DDC1 U1_DDC2: library part DDC232, "32 Channel Current-Input 20-Bit ADC, 0 to 70 degC, 64-pin BGA (ZXG64), Green (RoHS & no Sb/Br)", Analog Voltage AV/DD(Max)(V)=5.25, Analog Voltage AV/DD(Min)(V)=4.75, Manufacturer="Texas Instruments", Supplier Part Number 1=296-23858-1-ND, # Input Channels=32, Architecture=Delta-Sigma, ComponentLink1Description="Manufacturer URL", ComponentLink1URL=http://www.ti.com/, ComponentLink2Description=Datasheet, ComponentLink2URL=http://www.ti.com/general/docs/lit/getliterature.tsp?genericPartNumber=DDC232&fileType=pdf, ComponentLink3Description="Package Specification", ComponentLink3URL=http://www.ti.com/litv/pdf/mpbg581, DatasheetVersion=SBAS331D, Digital Supply(Max)(V)=3.6, Digital Supply(Min)(V)=2.7, Eco-Plan="Green (RoHS & no Sb/Br)", Manufacturer Part Number=DDC232CZXGR, Mounting Technology="Surface Mount", PackageDescription="64-Pin Plastic Ball Grid Array, Body 8 x 8 mm, Pitch 0.8 mm", PackageReference=ZXG64, PackageVersion="4206838/A, 02/2005", PartNumber=DDC232CZXGR, Resolution(Bits)=20, Sample Rate (max)(SPS)=3.125k, SubFamily="Low Power, 8-Bit, Dual 1.5 GSPS or Single 3.0 GSPS A/D Converter", Supplier 1=Digi-Key
U2: library part SN74HC08, "Quadruple 2-Input Positive-AND Gates, PW0014A, LARGE T&R", F @ Nom Voltage(Max)(Mhz)=70, ICC @ Nom Voltage(Max)(mA)=0.02, Manufacturer="Texas Instruments", Operating Temperature Range(C)="-40 to 85", Rating=Catalog, Supplier Part Number 1=296-8210-1-ND, tpd @ Nom Voltage(Max)(ns)=28, Voltage(Nom)(V)=5, Bits(#)=4, DatasheetVersion=SCLS081F, Generic Part Number=SN74HC08, Input Type=CMOS, Manufacturer Part Number=SN74HC08PWR, Output Type=CMOS, PackageReference=PW0014A, Schmitt Trigger=No, Supplier 1=Digi-Key, Supplier 2=Farnell, Supplier Part Number 2=3006560, Technology Family=HC, VCC(Max)(V)=6, VCC(Min)(V)=2
U3: "Single Mode Bluetooth Low Energy (BLE) Module Integrated Antenna, 1.8 to 3.6 V, -25 to 75 degC, 44-Pin SMD, RoHS, Tray", Manufacturer="Laird Wireless", Operating Temperature Max=75°C, Operating Temperature Min=-25°C, Package Description="44-Pin Surface Mount Device, Body 19 x 12.5 mm, Pitch 0.8 mm, Height 3.27 mm", Supplier Part Number 1=BL600-SA-ND, Supply Voltage Max=3.6V, Supply Voltage Min=1.8V, Bluetooth Class=Class2, Bluetooth Version=Bluetooth4.0, Data Rate=1Mbps, Datasheet URL=http://cdn.lairdtech.com/home/brandworld/files/BL600%20Hardware%20Integration%20Guide.pdf, Datasheet Version="Rev. 3.0, 04/2015", Manufacturer Part Number=BL600-SA, Manufacturer URL=https://www.lairdtech.com/, Mounting Technology=SurfaceMount, Package Reference=BL600-SA, Product Range=BL600Series, Receive Sensitivity=-91dBm, Signal Range Max=100m, Supplier 1=Digi-Key, Supplier 2=Farnell, Supplier Part Number 2=2321469, SVHC=NoSVHC(17-Dec-2014)
U4: "USB  to  serial  UART   interface", Supplier Part Number 1=768-1007-1-ND, Supplier 1=Digi-Key, Supplier 2=Farnell, Supplier Part Number 2=1146032
U5: library part LD1117, "Fixed Low Drop Positive Voltage Regulator, 3.3V, 4-Pin SOT-223, Tape and Reel", Manufacturer=STMicroelectronics, Supplier Part Number 1=497-1241-1-ND, ComponentLink1Description="Manufacturer URL", ComponentLink1URL=http://www.st.com, ComponentLink2Description=Datasheet, ComponentLink2URL=http://www.st.com/internet/com/TECHNICAL_RESOURCES/TECHNICAL_LITERATURE/DATASHEET/CD00000544.pdf, DatasheetVersion=1/11/2011, Manufacturer Part Number=LD1117S33CTR, PackageDescription="4-Pin SOT-223 Package, 6.5 x 3.5 mm Body, 2.3 mm Pitch, 7 mm Lead Span", PackageReference=SOT-223, PackageVersion=2010, Supplier 1=Digi-Key, Supplier 2=Farnell, Supplier Part Number 2=1467779
U6: library part OPA2350, "High-Speed, Single-Supply, Rail-to-Rail Operational Amplifier MicroAmplifier(TM) Series, 2.7 to 5.5 V, -40 to 85 degC, 8-pin SOP (DGK8), Green (RoHS & no Sb/Br)", Manufacturer="Texas Instruments", Supplier Part Number 1=OPA2350EACT-ND, Total Supply Voltage(Max)(+5V is 5, +/-5V is 10)=5.5, Total Supply Voltage(Min)(+5V is 5, +/-5V is 10)=2.7, CMRR(Min)(dB)=74, Code_JEDEC=MO-187, ComponentLink1Description="Manufacturer URL", ComponentLink1URL=http://www.ti.com/, ComponentLink2Description=Datasheet, ComponentLink2URL=http://www.ti.com/general/docs/lit/getliterature.tsp?genericPartNumber=OPA2350&fileType=pdf, ComponentLink3Description="Package Specification", ComponentLink3URL=http://www.ti.com/litv/pdf/mpds028d, DatasheetVersion=SBOS099C, Eco-Plan="Green (RoHS & no Sb/Br)", IIB(Max)(pA)=10, Iq per channel(Max)(mA)=8.5, Manufacturer Part Number=OPA2350EA/250, Mounting Technology="Surface Mount", Number of Channels=2, Offset Drift(Typ)(uV/C)=4, PackageDescription="8-Pin Thin Small Outline, Body 3 x 3 mm, Pitch 0.65 mm", PackageReference=DGK0008A, PackageVersion="4073329/E, 05/2006", PartNumber=OPA2350EA/250, Slew Rate(Typ)(V/us)=22, Sub Family="Low Input Bias Current Amp (<=10pA), Low Offset Voltage Amplifier (<=500uV), Low Supply Voltage Amplifier (<=2.7V), Precision Amplifier", Supplier 1=Digi-Key, Supplier 2=Farnell, Supplier Part Number 2=3117460, Vio (25C)(Max)(mV)=1, Vn at 1kHz(Typ)(nV/rtHz)=18
U7: library part REF3040, "4.096 V, 50 ppm / degC, 50 uA Series (Bandgap) Voltage Reference, -40 to 125 degC, 3-pin SOT-23 (DBZ), Green (RoHS & no Sb/Br)", Manufacturer="Texas Instruments", Rating=Catalog, Supplier Part Number 1=REF3040AIDBZTCT-ND, Temp Coeff(Max)(ppm/ degree C)=50, Temp Coeff(Typ)(ppm/ degree C)=20, Code_JEDEC=TO-236, ComponentLink1Description="Manufacturer URL", ComponentLink1URL=http://www.ti.com/, ComponentLink2Description=Datasheet, ComponentLink2URL=http://www.ti.com/general/docs/lit/getliterature.tsp?genericPartNumber=REF3040&fileType=pdf, ComponentLink3Description="Package Specification", ComponentLink3URL=http://www.ti.com/litv/pdf/mpds108a, DatasheetVersion=SBVS032F, Eco-Plan="Green (RoHS & no Sb/Br)", Initial Accuracy @ 25/deg C(%)=0.2, Iq(Max)(uA)=50, Manufacturer Part Number=REF3040AIDBZT, Mounting Technology="Surface Mount", PackageDescription="3-Pin Plastic Small Outline, Body 2.92 x 1.3 mm, Pitch 0.95 mm", PackageReference=DBZ0003A, PackageVersion=4203227/B, PartNumber=REF3040AIDBZT, SubFamily="Series Voltage Reference", Supplier 1=Digi-Key, Supplier 2=Farnell, Supplier Part Number 2=3124532, VI(Max)(V)=5.5, VI(Min)(V)=4.097, VO(V)=4.096

## Free pads (board coordinates)
  round 0 hole 1.6 unplated: ""(23.8,0)

## Via types
v1: diameter 0.4, hole 0.2, Top Layer to Bottom Layer, tented both sides, 401 vias

## Nets (pads, with @x,y where several pads share a name; then routed paths per layer and width w, separated by ;. In a path a pad name is that pad's centre, name@x,y a point inside that pad or via, vN(x,y) a via of type N, cw(c..) or ccw(c..) an arc to the next point about the centre after c; other vN are vias at no path point)
3V3: C3_DDC1.2 C3_DDC2.2 C4.1 C5.2 C9.1 C11.1 C13.1 C15.1 C18.1 C19.1 OSC1.4 P3.1 R35.2 R36.2 R37.2 R38.2 R39.2 R40.2 R41.2 R42.2 R47.2 R48.2 TP22.1 U1_DDC1.B7 U1_DDC2.B7 U2.14 U3.10 U4.4 U5.2 U5.4 | length 29.8
  Top Layer w0.15: U1_DDC2.B7@18,-6.6 18.4,-6.2 18.4,-5.6 18.899,-5.101 18.932,-5.101 19.032,-5 v1(19.1,-5) ; v1(19.7,5.8) C3_DDC1.2@20.2,5.8 ; v1(22.4,-12.2) C4.1@22.8,-12.2 ; v1(23.4,-2.4) R48.2@23.9,-2.4 ; R47.2@23.9,2.4 v1(23.9,2.9) ; TP22.1@26.2,12.9 26.363,13.063 26.676,13.063 26.713,13.1 C9.1@27.1,13.1 ; v1(26.7,9.3) U5.4@26.7,7.4 v1(28.2,7.4) ; C9.1@27.4,13.3 27.5,13.2 C11.1@27.5,12.2 ; U3.10@29,-9.2 30.112,-9.2 30.2,-9.112 v1(30.2,-9.1) ; v1(31.1,7.4) U5.2@32.5,7.4 ; R42.2@32.8,2.5 R39.2@35,2.5 ; U5.2@33.5,7.1 33.9,6.7 C19.1@34.7,6.7 ; R41.2@33.9,2.6 v1(33.9,3) ; C19.1@34.8,6.8 36.05,6.8 C18.1@36.2,6.95 ; R40.2@37,2.5 R38.2@38.1,2.5 R37.2@39.2,2.5 R36.2@40.3,2.5 R35.2@41.4,2.5 ; R37.2@39.2,2.6 v1(39.2,3)
  Bottom Layer w0.15: U1_DDC1.B7@18,6.6 18.4,6.2 19.1,6.2 19.5,5.8 v1(19.7,5.8) ; P3.1@25.7,-9.6 C15.1@26.9,-9.6 ; U4.4@27,13.5 U4.4@27.1,13.4 U4.4@27.1,13.1 ; U4.4@27.013,13.013 U4.4@27.1,13.1 ; v1(27.1,12.2) U4.4@27.1,13.1 ; v1(30.2,-9.1) C13.1@30.9,-9.1 ; C5.2@30.6,-4.8 30.6,-4.75 30.9,-4.45 v1(30.9,-4.425) ; C5.2@30.7,-4.8 U2.14@32.2,-4.8
  other v1: 35.2,6.8
AGND: C1_DDC1.2 C1_DDC2.2 C2_DDC1.1 C2_DDC2.1 C6_DDC1.2 C6_DDC2.2 C20.2 C22.2 C24.2 C25.2 C26.2 C27.2 P1.1 P1.18 P2.1 P2.18 P6.1 P6.18 P7.1 P7.18 R54.1 U1_DDC1.A5 U1_DDC1.B5 U1_DDC1.C5 U1_DDC1.D5 U1_DDC1.D6 U1_DDC1.E5 U1_DDC1.F5 U1_DDC1.G5 U1_DDC1.H5 U1_DDC1.H6 U1_DDC2.A5 U1_DDC2.B5 U1_DDC2.C5 U1_DDC2.D5 U1_DDC2.D6 U1_DDC2.E5 U1_DDC2.F5 U1_DDC2.G5 U1_DDC2.H5 U1_DDC2.H6 U6.4 U7.3 | length 26.4
  Top Layer w0.15: P7.18@5.05,-11.25 5.05,-11.55 v1(5.1,-11.6) ; P7.1@5.05,-2.75 5.075,-2.725 5.9,-2.725 v1(5.925,-2.7) ; P2.18@5.05,2.75 v1(5.95,2.75) v1@6,2.8 ; P2.1@5.05,11.25 5.062,11.25 5.137,11.325 5.137,11.537 v1(5.2,11.6) ; C27.2@12.7,-0.6 12.7,-1.5 C1_DDC1.2@12.8,-1.6 ; C27.2@12.8,-0.6 13.1,-0.6 13.5,-1 14.25,-1 U6.4@14.275,-0.975 ; C2_DDC1.1@14.9,13.55 C2_DDC1.1@15,13.45 ; C2_DDC1.1@15.2,13.4 16.1,13.4 C26.2@16.2,13.3 v1(16.2,13.8) ; U1_DDC2.A5@16.4,-5.8 U1_DDC2.B5@16.4,-6.6 U1_DDC2.C5@16.4,-7.4 U1_DDC2.D5@16.4,-8.2 ; U1_DDC2.H6@17.2,-11.4 U1_DDC2.H5@16.4,-11.4 U1_DDC2.G5@16.4,-10.6 U1_DDC2.F5@16.4,-9.8 U1_DDC2.E5@16.4,-9 U1_DDC2.D5@16.4,-8.2 ; U1_DDC2.D6@17.2,-8.2 U1_DDC2.D5@16.4,-8.2
  Bottom Layer w0.15: P6.1@5.05,-11.25 5.1,-11.3 v1(5.1,-11.6) ; P6.18@5.05,-2.75 5.075,-2.725 5.9,-2.725 v1(5.925,-2.7) ; P1.1@5.05,2.75 5.85,2.75 v1@5.9,2.7 ; P1.18@5.05,11.25 5.125,11.25 5.2,11.325 v1(5.2,11.6) ; v1(11.1,0.4) C1_DDC2.2@12,0.4 ; U1_DDC1.A5@16.4,5.8 U1_DDC1.B5@16.4,6.6 16.4,7 ; v1(16.8,7) 16.4,7 ; U1_DDC1.D6@17.2,8.2 U1_DDC1.D5@16.4,8.2 ; U1_DDC1.H6@17.2,11.4 U1_DDC1.H5@16.4,11.4 U1_DDC1.G5@16.4,10.6 U1_DDC1.F5@16.4,9.8 U1_DDC1.E5@16.4,9 U1_DDC1.D5@16.4,8.2 ; C20.2@17.3,0.3 C22.2@17.3,1.4 ; 16.4,7 U1_DDC1.C5@16.4,7.4 U1_DDC1.D5@16.4,8.2
  other v1: 1.4,-14.5 2.5,-14.5 3.6,-14.5 18.028,-14.14 16.6,-12.9 0.5,-11.8 10.2,-11.4 12.2,-11.4 1.528,-11.14 0.5,-10.7 2.278,-9.64 3.778,-9.64 0.5,-9.6 0.5,-8.5 1.528,-8.14 3.028,-8.14 0.5,-7.4 2.278,-6.64 3.778,-6.64 0.5,-6.3 0.5,-5.2 1.528,-5.14 3.028,-5.14 0.5,-4.1 2.278,-3.64 0.5,-3 1.528,-2.14 3.028,-2.14 19.2,-2 0.5,2.2 2.278,2.36 18.778,2.36 0.5,3.3 1.528,3.86 14,4.3 0.5,4.4 2.278,5.36 0.5,5.5 0.5,6.6 1.528,6.86 0.5,7.7 2.278,8.36 0.5,8.8 1.528,9.86 0.5,9.9 0.5,11 16.5,11 10.6,11.3 2.278,11.36 19.4,12.8 18.028,12.86 15.7,13.4 1.4,14.5 2.5,14.5 3.6,14.5 9.9,14.5 11,14.5 12.1,14.5 15.4,14.5 16.5,14.5 17.6,14.5 18.7,14.5 19.8,14.5
AVDD_5V: C2_DDC1.2 C2_DDC2.2 C22.1 C26.1 R52.1 TP26.1 U1_DDC1.E6 U1_DDC1.F6 U1_DDC1.G6 U1_DDC2.E6 U1_DDC2.F6 U1_DDC2.G6 U6.8 U7.1 | length 16.7
  Top Layer w0.15: TP26.1@13.8,12 13.85,12.05 C2_DDC1.2@14.9,12.05 15.9,12.05 16.15,12.3 C26.1@16.2,12.3 16.375,12.475 16.475,12.475 v1(16.6,12.6) 17.188,13.188 17.188,13.5 17.388,13.7 U7.1@17.4,13.7 ; U1_DDC2.G6@17.2,-10.6 17.6,-11 17.6,-12.4 v1(18.1,-12.9) ; U1_DDC2.G6@17.2,-10.5 U1_DDC2.F6@17.2,-9.8 U1_DDC2.E6@17.2,-9 ; U7.1@17.8,13.7 18.1,14 R52.1@20.6,14 ; U6.8@18.7,1 U6.8@18.725,0.975 ; U6.8@18.8,1 v1(18.8,1.4)
  Bottom Layer w0.15: v1(16.6,12.6) 17,12.2 17.2,12.2 17.6,11.8 17.6,11 U1_DDC1.G6@17.2,10.6 U1_DDC1.F6@17.2,9.8 U1_DDC1.E6@17.2,9 ; C22.1@18.3,1.4 v1@18.7,1.4
BL600_CTS: R38.1 TP15.1 U3.35 U4.3 | length 24.2
  Top Layer w0.15: R38.1@38.2,1.4 38.25,1.4 38.3,1.35 38.3,1.3 38.493,1.107 38.7,0.9 U3.35@38.7,-0.15
  Layer 2 w0.15: v1(35.7,10.5) 36.3,9.9 36.3,3.6 36.8,3.1 v1(36.7,3.2) 38.479,1.421 v1(38.479,1.092)
  Bottom Layer w0.15: U4.3@26.45,13.4 26.45,11.45 27.4,10.5 v1(35.7,10.5)
BL600_DCD: R41.1 TP18.1 U3.41 U4.10 | length 16.9
  Top Layer w0.15: v1(30.8,11.8) 29.6,10.6 29.6,4.224 31.824,2 33.4,2 33.7,1.7 33.7,1.65 33.85,1.5 R41.1@33.9,1.5 U3.41@33.9,-0.15
  Bottom Layer w0.15: v1(30.8,11.8) 30.8,11.846 30.967,12.013 30.967,13.367 U4.10@31,13.4
BL600_DSR: R40.1 TP17.1 U3.36 U4.9 | length 20.6
  Top Layer w0.15: R40.1@37.1,1.4 37.15,1.4 37.2,1.35 37.2,1.3 37.75,0.75 37.75,0 U3.36@37.9,-0.15
  Layer 2 w0.15: v1(35.1,11.975) 35.1,10.3 36,9.4 36,2.1 36.399,1.701 36.399,1.668 36.5,1.568 v1(36.5,1.5)
  Bottom Layer w0.15: U4.9@30.35,13.4 30.45,13.5 30.45,14.25 30.7,14.5 34.2,14.5 35.1,13.6 v1(35.1,11.975)
BL600_DTR: R39.1 TP16.1 U3.40 U4.2 | length 23.9
  Top Layer w0.15: U3.40@34.7,-0.15 34.7,1.2 34.8,1.3 34.8,1.35 34.85,1.4 R39.1@34.9,1.4
  Layer 2 w0.15: v1(34.6,9.8) 35.1,9.8 35.7,9.2 35.7,1.713 35.5,1.513 v1(35.5,1.5)
  Bottom Layer w0.15: 24.3,11 25.4,11 25.8,11.4 ; U4.2@25.8,13.4 25.8,11.4 ; v1(34.6,9.8) 34.583,9.8 34.283,10.1 27.1,10.1 25.8,11.4
BL600_RI: R42.1 U3.42 U4.6 | length 16.1
  Top Layer w0.15: v1(28.6,11.2) 29.3,10.5 29.3,4.1 31.7,1.7 32.487,1.7 32.512,1.675 32.625,1.675 R42.1@32.8,1.5 32.85,1.5 33,1.35 33,1.3 33.1,1.2 U3.42@33.1,-0.15
  Bottom Layer w0.15: U4.6@28.4,13.4 28.4,11.4 v1(28.6,11.2)
BL600_RTS: R37.1 TP14.1 U3.34 U4.11 | length 19.3
  Top Layer w0.15: R37.1@39.2,1.4 39.35,1.4 39.4,1.35 39.4,1.2 v1(39.5,1.1) U3.34@39.5,-0.15
  Layer 2 w0.15: v1(36.4,11.1) 36.4,11.087 36.6,10.887 36.6,4 v1(39.5,1.1)
  Bottom Layer w0.15: U4.11@31.65,13.4 31.65,12.417 32.867,11.2 36.3,11.2 v1(36.4,11.1)
BL600_RX: P4.1 R36.1 SJ2.1 U3.33 | length 20.9
  Top Layer w0.15: P4.1@26.4,2.11 26.9,2.61 SJ2.1@26.9,3.9 ; v1(30.45,1.3) 30.9,0.85 30.9,-0.9 31.45,-1.45 39.85,-1.45 40.3,-1 U3.33@40.3,-0.15 R36.1@40.3,1.4
  Bottom Layer w0.15: P4.1@26.5,2.1 29.65,2.1 v1(30.45,1.3)
BL600_TX: P4.2 R35.1 SJ3.1 U3.32 | length 18.8
  Top Layer w0.15: P4.2@26.6,0.84 SJ3.1@28.04,0.84 ; SJ3.1@28.1,0.8 28.35,0.8 28.625,0.525 28.625,0.475 29,0.1 30.2,0.1 30.6,-0.3 30.6,-1.024 31.351,-1.775 40.325,-1.775 41.1,-1 U3.32@41.1,-0.15 41.1,1.2 41.2,1.3 41.2,1.35 41.25,1.4 R35.1@41.3,1.4
BL_SCL: P4.4 R48.1 TP24.1 U3.13 | length 20.4
  Top Layer w0.15: R48.1@24.9,-2.4 25.6,-1.7 P4.4@26.3,-1.7 ; P4.4@26.8,-1.7 26.8,-1.5 27.325,-0.975 29.702,-0.975 31.127,-2.4 32.1,-2.4 32.6,-2.9 32.6,-9.9 31.5,-11 U3.13@31.5,-12.65 ; TP24.1@30,-13 30.213,-13 30.513,-13.3 U3.13@31.4,-13.3
BL_SDA: P4.3 R47.1 TP23.1 U3.12 | length 21.3
  Top Layer w0.15: R47.1@25,2.25 25.075,2.175 25.875,1.375 25.875,0.295 P4.3@26.6,-0.43 ; v1(27.7,-1.4) 29.7,-1.4 31,-2.7 31.9,-2.7 32.3,-3.1 32.3,-9.7 31.2,-10.8 U3.12@29,-10.8 ; TP23.1@28.5,-11.7 U3.12@28.5,-10.9
  Bottom Layer w0.15: P4.3@26.6,-0.43 26.73,-0.43 v1(27.7,-1.4)
CLK_CFG_SEL: TP11.1 U2.2 U2.10 U3.7 | length 15.6
  Top Layer w0.15: U3.7@29,-6.8 v1(30.9,-6.8) 31.4,-6.3 31.4,-3.613 31.6,-3.413 v1(31.6,-3.4)
  Bottom Layer w0.15: v1(30.9,-6.8) TP11.1@31,-6.8 31.55,-7.35 U2.10@32.55,-7.35 ; v1(31.6,-3.4) 32.1,-3.9 33.7,-3.9 34,-4.2 34,-4.7 34.7,-5.4 U2.2@38.65,-5.4
D\D\C\_\R\E\S\E\T\: TP3.1 U1_DDC1.C7 U1_DDC2.C7 U3.19 | length 47.2
  Top Layer w0.15: U1_DDC2.C7@18,-7.4 18.4,-7 19.487,-7 19.687,-7.2 v1(19.7,-7.2) ; v1(19.1,-12.6) 19.6,-12.6 23.3,-8.9 26.5,-8.9 27.3,-9.7 27.3,-11.7 29.4,-13.8 36,-13.8 36.163,-13.637 36.163,-12.787 U3.19@36.3,-12.65
  Bottom Layer w0.15: U1_DDC1.C7@18,7.4 18.4,7 19.8,7 20.3,6.5 20.3,-5.8 19.7,-6.4 v1(19.7,-7.2) 19.7,-8.9 19,-9.6 19,-12.5 v1(19.1,-12.6)
D\D\C\_\V\A\L\I\D\: U1_DDC2.H7 U3.9 | length 12.8
  Top Layer w0.15: U1_DDC2.H7@18,-11.4 18.048,-11.448 18.048,-11.648 18.3,-11.9 19.824,-11.9 23.124,-8.6 26.6,-8.6 26.8,-8.4 U3.9@29,-8.4
D_N: D1.6 U4.16 | length 5.4
  Bottom Layer w0.15: U4.16@32.95,6 U4.16@33,6.05 ; U4.16@33,6.25 33,8.166 33.734,8.9 34.871,8.9 35.396,9.425 35.575,9.425 D1.6@35.8,9.65
D_P: D1.4 U4.15 | length 4.6
  Bottom Layer w0.15: U4.15@33.6,6.2 33.6,8.2 33.9,8.5 34.534,8.5 34.871,8.5 35.1,8.271 35.396,7.975 35.575,7.975 D1.4@35.8,7.75
DCLK_SEL: TP5.1 U2.5 U2.13 U3.4 | length 12.7
  Top Layer w0.15: U3.4@29,-4.4 29.159,-4.559 29.959,-4.559 30.3,-4.9 30.3,-5.2 v1(30.6,-5.5)
  Bottom Layer w0.15: v1(30.6,-5.5) 32.45,-5.5 U2.13@32.55,-5.4 ; U2.13@32.9,-5.4 33.4,-5.4 34.2,-6.2 34.2,-6.7 34.7,-7.2 38.5,-7.2 U2.5@38.65,-7.35 40.25,-7.35 TP5.1@40.3,-7.3
DDC_CONV: TP1.1 U1_DDC1.A8 U1_DDC2.A8 U3.6 | length 22.7
  Top Layer w0.15: U1_DDC2.A8@18.8,-5.8 v1(19.6,-5.8) 19.9,-5.8 20.1,-6 TP1.1@21.6,-6 U3.6@29,-6 U3.6@28.888,-6.112
  Bottom Layer w0.15: U1_DDC1.A8@18.8,5.8 20,4.6 20,-5.387 19.6,-5.787 v1(19.6,-5.8)
GND: C3_DDC1.1 C3_DDC2.1 C4.2 C5.1 C7.2 C8.2 C9.2 C10.2 C11.2 C12.2 C13.2 C14.1 C15.2 C16.2 C17.2 C18.2 C19.2 C21.2 C23.2 D1.2 FB2.2 OSC1.2 P3.4 P4.6 P5.3 R43.1 R45.2 R49.2 R50.2 R54.2 TP27.1 U1_DDC1.A7 U1_DDC1.B8 U1_DDC1.C6 U1_DDC1.C8 U1_DDC1.D7 U1_DDC1.E7 U1_DDC1.G8 U1_DDC2.A7 U1_DDC2.C6 U1_DDC2.C8 U1_DDC2.D7 U1_DDC2.E7 U1_DDC2.G8 U2.7 U3.1 U3.3 U3.11 U3.17 U3.28 U3.29 U3.31 U3.37 U3.43 U4.7 U4.18 U4.21 U4.25 U4.26 U5.1 | length 25.7
  Top Layer w0.15: U1_DDC2.C6@17.2,-7.4 U1_DDC2.D7@18,-8.2 ; U1_DDC2.E7@18,-9 v1(18,-8.6) U1_DDC2.D7@18,-8.2 ; U1_DDC2.A7@18,-5.8 18,-5.5 18.4,-5.1 18.4,-4.4 v1(19.3,-3.5) ; U1_DDC2.G8@18.8,-10.6 18.881,-10.6 18.981,-10.7 v1(19.5,-10.7) ; U1_DDC2.C8@18.8,-7.4 U1_DDC2.D7@18,-8.2 ; C11.2@28.6,12.2 28.65,12.25 v1(29.05,12.25) ; C16.2@31.8,12.2 32.025,11.975 32.2,11.8 C17.2@32.2,11.2 ; v1(32,1.1) 32.263,0.837 32.263,-0.113 U3.43@32.3,-0.15 ; 36.3,1 36.9,1 37.063,0.837 37.063,-0.113 U3.37@37.1,-0.15 ; U3.28@43.5,-12.65 v1(43.5,-11.6)
  Bottom Layer w0.15: U1_DDC1.C6@17.2,7.4 U1_DDC1.D7@18,8.2 U1_DDC1.C8@18.8,7.4 19.7,7.4 v1(19.8,7.5) ; U1_DDC1.A7@18,5.8 19,4.8 v1(19.1,4.8) ; U1_DDC1.D7@18,8.3 U1_DDC1.E7@18,9 ; U1_DDC1.B8@18.8,6.6 19.5,6.6 v1(19.6,6.5) ; U1_DDC1.G8@18.8,10.6 19.407,10.6 19.507,10.5 v1(19.575,10.5) ; U4.7@29.05,13.4 v1(29.05,12.25) v1@29.1,12.2 ; C13.2@30.8,-10.1 v1(31.2,-10.1) ; P5.3@35.03,-13.4 35.1,-13.33 C21.2@35.1,-11.8 ; C21.2@35.1,-11.7 v1(35.1,-11.1) ; v1(37.6,-8.7) 37.625,-8.675 38.575,-8.675 38.6,-8.7 U2.7@38.65,-8.65 38.675,-8.675 39.675,-8.675 v1(39.7,-8.7)
  other v1: 19,-14.5 20.1,-14.5 21.2,-14.5 22.3,-14.5 23.4,-14.5 24.5,-14.5 25.6,-14.5 26.7,-14.5 27.8,-14.5 19.528,-14.14 40.528,-14.14 42.028,-14.14 43.528,-14.14 22.1,-13.2 24.778,-12.64 30.778,-12.64 39.028,-11.14 40.528,-11.14 42.028,-11.14 43.8,-10.6 30.2,-10.1 27.9,-10 24.778,-9.64 35.278,-9.64 36.778,-9.64 38.278,-9.64 39.778,-9.64 41.278,-9.64 42.778,-9.64 43.8,-9.5 40.528,-8.14 42.028,-8.14 43.528,-8.14 43.8,-7 41.278,-6.64 42.778,-6.64 43.8,-6.1 22.528,-5.14 42.028,-5.14 43.528,-5.14 43.8,-4.3 23.9,-4.2 36.778,-3.64 38.278,-3.64 39.778,-3.64 41.278,-3.64 42.778,-3.64 27.7,-3.6 30.3,-3.6 23.3,-3.5 43.8,-3.2 22.528,-2.14 42.028,-2.14 43.528,-2.14 43.8,-1.5 44.1,1.3 45,2.3 23.278,2.36 42.778,2.36 44.278,2.36 30.1,2.4 32,2.5 45.8,3.1 27.9,3.3 22.528,3.86 24.028,3.86 34.528,3.86 37.528,3.86 39.028,3.86 40.528,3.86 42.028,3.86 43.528,3.86 45.028,3.86 46.528,3.86 28.4,4.3 34.1,4.9 23.278,5.36 35.2,5.5 47.5,5.8 22.528,6.86 24.028,6.86 37.528,6.86 43.528,6.86 45.028,6.86 47.5,6.9 23.278,8.36 32.278,8.36 42.778,8.36 44.278,8.36 45.778,8.36 47.278,8.36 37.6,8.7 21.028,9.86 22.528,9.86 24.028,9.86 43.528,9.86 45.028,9.86 47.5,10.3 31.7,11.2 21.778,11.36 29.278,11.36 42.778,11.36 44.278,11.36 45.778,11.36 47.278,11.36 47.5,12.4 38.4,12.6 39.2,12.6 22.528,12.86 24.028,12.86 43.528,12.86 45.028,12.86 34.2,12.9 35.6,12.9 22.5,14.5 23.6,14.5 24.7,14.5 25.8,14.5 35.1,14.5 36.2,14.5 37.3,14.5 38.4,14.5 41.5,14.5 42.6,14.5 43.7,14.5 44.8,14.5 45.9,14.5
NetC1_DDC1_1: C1_DDC1.1 R1_DDC1.1 | length 1
  Top Layer w0.15: R1_DDC1.1@11.6,-3.2 C1_DDC1.1@12.6,-3.2
NetC1_DDC2_1: C1_DDC2.1 R1_DDC2.1 | length 1
  Bottom Layer w0.15: C1_DDC2.1@12.1,-1.15 C1_DDC2.1@12.187,-1.063 ; C1_DDC2.1@12.5,-1.3 12.625,-1.425 12.625,-1.438 12.7,-1.513 R1_DDC2.1@12.7,-2.1
NetC6_DDC1_1: C6_DDC1.1 R34_DDC1.1 | length 0.8
  Top Layer w0.15: C6_DDC1.1@16.2,4.3 16.3,4.4 R34_DDC1.1@16.3,5.1
NetC6_DDC2_1: C6_DDC2.1 R34_DDC2.1 | length 1.4
  Bottom Layer w0.15: C6_DDC2.1@16.599,-3 16.833,-3.234 17.234,-3.234 17.375,-3.375 17.675,-3.375 R34_DDC2.1@17.8,-3.5
NetC12_1: C12.1 J1.Shell R43.2 | length 20.2
  Bottom Layer w0.15: R43.2@40.2,13.2 40.2,13.25 40.35,13.4 40.4,13.4 40.5,13.5 J1.Shell@41.4,13.5 ; R43.2@40.2,13.3 C12.1@40.2,14.2 ; J1.Shell@41.72,5.03 46.33,5.03 J1.Shell@46.4,5.1 ; J1.Shell@41.72,13.57 46.23,13.57 J1.Shell@46.3,13.5 ; J1.Shell@46.3,13.6 46.45,13.45 J1.Shell@46.45,5.03
NetC14_2: C14.2 U4.17 | length 2.3
  Bottom Layer w0.15: U4.17@32.3,6 32.333,5.967 32.333,5.067 32.967,4.433 32.967,4.033 C14.2@33,4
NetC20_1: C20.1 R46.1 | length 1
  Bottom Layer w0.15: R46.1@16.3,-0.7 C20.1@16.3,0.3
NetC24_1: C24.1 C25.1 R53.1 U6.3 U6.5 | length 16.1
  Top Layer w0.15: U6.3@14.4,-0.3 15.4,-0.3 ; R53.1@16.4,10.05 16.575,9.875 16.625,9.875 17.225,9.275 17.225,9.225 17.35,9.1 C25.1@17.4,9.1 ; C24.1@16.9,7.75 16.75,7.75 16.3,7.3 16.3,7 15.4,6.1 15.4,-0.3 ; C24.1@16.9,7.95 17.025,7.95 17.3,8.225 17.3,8.9 C25.1@17.4,9 ; U6.5@18.725,-0.975 16.075,-0.975 15.4,-0.3
NetC27_1: C27.1 R51.1 | length 1.2
  Top Layer w0.15: C27.1@11.7,-0.6 R51.1@11.7,0.6
NetFB1_2: FB1.2 J1.A4 J1.A9 J1.B4 J1.B9 | length 10.9
  Top Layer w0.15: v1@38.2,10.6 38.148,10.652 38.085,10.652 38.032,10.599 37.999,10.599 36.7,9.3 36.7,8.1 37,7.8 38.466,7.8 38.641,7.975 39.245,7.975 J1.A4@39.32,8.05 40.45,8.05 J1.B9@40.5,8 ; v1(38.2,10.7) v1@38.227,10.673 ; v1@38.25,10.65 38.35,10.55 J1.A9@39.32,10.55 40.45,10.55 J1.B4@40.5,10.5
  Bottom Layer w0.15: v1@38.2,10.8 38.7,11.3 38.95,11.55 FB1.2@38.95,11.7
NetFB2_1: FB2.1 J1.A1 J1.A12 J1.B1 J1.B12 | length 12.7
  Top Layer w0.15: J1.A1@39.32,6.55 40.55,6.55 J1.B12@40.6,6.5 ; J1.A12@39.32,12.05 40.45,12.05 J1.B1@40.5,12.1
  Bottom Layer w0.15: FB2.1@39.4,5.8 39.8,5.8 40.5,6.5 J1.B12@40.58,6.5 40.597,6.5 40.897,6.2 41.6,6.2 42.1,6.7 42.1,11.9 41.7,12.3 40.9,12.3 40.864,12.264 40.853,12.264 40.7,12.112 J1.B1@40.7,12.1
NetOSC1_3: OSC1.3 SJ1.3 | length 3.7
  Bottom Layer w0.15: SJ1.3@20.8,-9 SJ1.3@20.7,-9.1 ; OSC1.3@21,-11.85 20.5,-11.35 SJ1.3@20.5,-9.5 ; SJ1.3@20.5,-9.5 SJ1.3@20.5,-9.3 ; SJ1.3@20.5,-9.5 SJ1.3@20.5,-9.3 ; SJ1.3@20.5,-9.3 SJ1.3@20.7,-9.1 ; SJ1.3@20.5,-9.3 SJ1.3@20.7,-9.1
NetP1_2: P1.2 R2_DDC2.1 U1_DDC2.H4 | length 31.9
  Top Layer w0.15: v1(6.7,-10.8) 7.2,-11.3 7.2,-11.676 7.449,-11.925 8.025,-11.925 8.3,-12.2 9.3,-12.2 10.4,-13.3 14.876,-13.3 15.6,-12.576 U1_DDC2.H4@15.6,-11.4
  Layer 2 w0.15: v1(6.05,3.3) 6.024,3.274 5.774,3.274 5.5,3 5.5,-10 6.3,-10.8 v1(6.7,-10.8)
  Bottom Layer w0.15: v1(6.05,3.3) 6,3.3 5.95,3.25 P1.2@5.05,3.25 4.991,3.191 4.188,3.191 4.1,3.103 4.1,2.4 4.35,2.15 5.75,2.15 6.1,1.8 R2_DDC2.1@6.1,1.7
NetP1_3: P1.3 R3_DDC2.1 U1_DDC2.G4 | length 34.2
  Top Layer w0.15: v1(6.7,-11.6) 7.325,-12.225 7.817,-12.225 8.092,-12.5 9.1,-12.5 10.2,-13.6 15,-13.6 16.005,-12.595 16.005,-12.258 16,-12.253 16,-11.589 16.005,-11.584 16.005,-11.005 U1_DDC2.G4@15.6,-10.6
  Layer 2 w0.15: v1(3.95,4) 5.2,2.75 5.2,-10.124 6.676,-11.6 v1(6.7,-11.6)
  Bottom Layer w0.15: v1(3.95,4) 3.95,3.894 4.1,3.744 4.1,3.7 ; P1.3@5.05,3.75 5,3.7 4.1,3.7 ; R3_DDC2.1@5.3,1.6 5.251,1.6 5.026,1.825 4.075,1.825 3.8,2.1 3.8,3.4 4.1,3.7
NetP1_4: P1.4 R4_DDC2.1 U1_DDC2.F4 | length 24.7
  Top Layer w0.15: v1(15.299,-9.499) U1_DDC2.F4@15.6,-9.8
  Layer 2 w0.15: v1(14.5,1.9) 14.525,1.875 14.776,1.875 15.25,1.402 15.7,0.951 15.7,-6.1 15.1,-6.7 15.1,-8.324 15.3,-8.524 v1(15.299,-9.499)
  Bottom Layer w0.15: P1.4@5.05,4.25 5.1,4.2 5.9,4.2 6.8,3.3 6.8,2.4 7.1,2.1 7.1,1.75 7.15,1.7 R4_DDC2.1@7.2,1.7 ; R4_DDC2.1@7.3,1.6 7.35,1.6 7.525,1.425 7.525,1.375 7.8,1.1 8.698,1.1 9.423,1.826 ; 9.424,1.826 9.699,2.1 14.287,2.1 14.487,1.9 v1(14.5,1.9)
NetP1_5: P1.5 R5_DDC2.1 U1_DDC2.E4 | length 24.5
  Top Layer w0.15: U1_DDC2.E4@15.6,-9 15.6,-8.988 15.875,-8.713 v1(15.875,-8.7)
  Layer 2 w0.15: v1(14.501,2.601) 14.501,2.575 16,1.076 16,-6.3 15.4,-6.9 15.4,-8.2 15.875,-8.675 v1(15.875,-8.7)
  Bottom Layer w0.15: P1.5@5.05,4.75 5.125,4.675 5.901,4.675 7.1,3.476 7.1,2.626 7.576,2.15 7.75,2.15 8.075,1.825 8.075,1.775 8.25,1.6 R5_DDC2.1@8.3,1.6 8.8,2.1 9.275,2.1 9.575,2.4 13.6,2.4 13.85,2.65 14.276,2.65 14.277,2.649 14.453,2.649 v1(14.501,2.601)
NetP1_6: P1.6 R6_DDC2.1 U1_DDC2.H2 | length 23
  Top Layer w0.15: v1(13.699,-11.099) 13.714,-11.099 14,-11.385 U1_DDC2.H2@14,-11.4
  Layer 2 w0.15: v1(11.075,2.825) 11.1,2.8 11.1,2.7 11.8,2 11.8,-9.2 v1(13.699,-11.099)
  Bottom Layer w0.15: P1.6@5.05,5.25 5.109,5.191 5.809,5.191 7.525,3.475 7.525,3.225 7.65,3.1 R6_DDC2.1@7.7,3.1 ; R6_DDC2.1@7.7,3 7.7,2.95 7.85,2.8 7.9,2.8 8.3,2.4 9.15,2.4 9.55,2.8 11.05,2.8 v1(11.075,2.825)